# Altium PCB Industrial_IOT_Dev_Brd-v1.0.PcbDoc (part 1 of 8)
Units mil, origin at the board's own origin, x right, y up, seen from the top; angles counter-clockwise.
Board outline 6299.21 x 4724.41 mil, 4 copper layers (Top Layer, Layer 1, Layer 2, Bottom Layer), stack 62.047 mil thick; 376 components, 240 nets, 1129 pads, 635 vias.
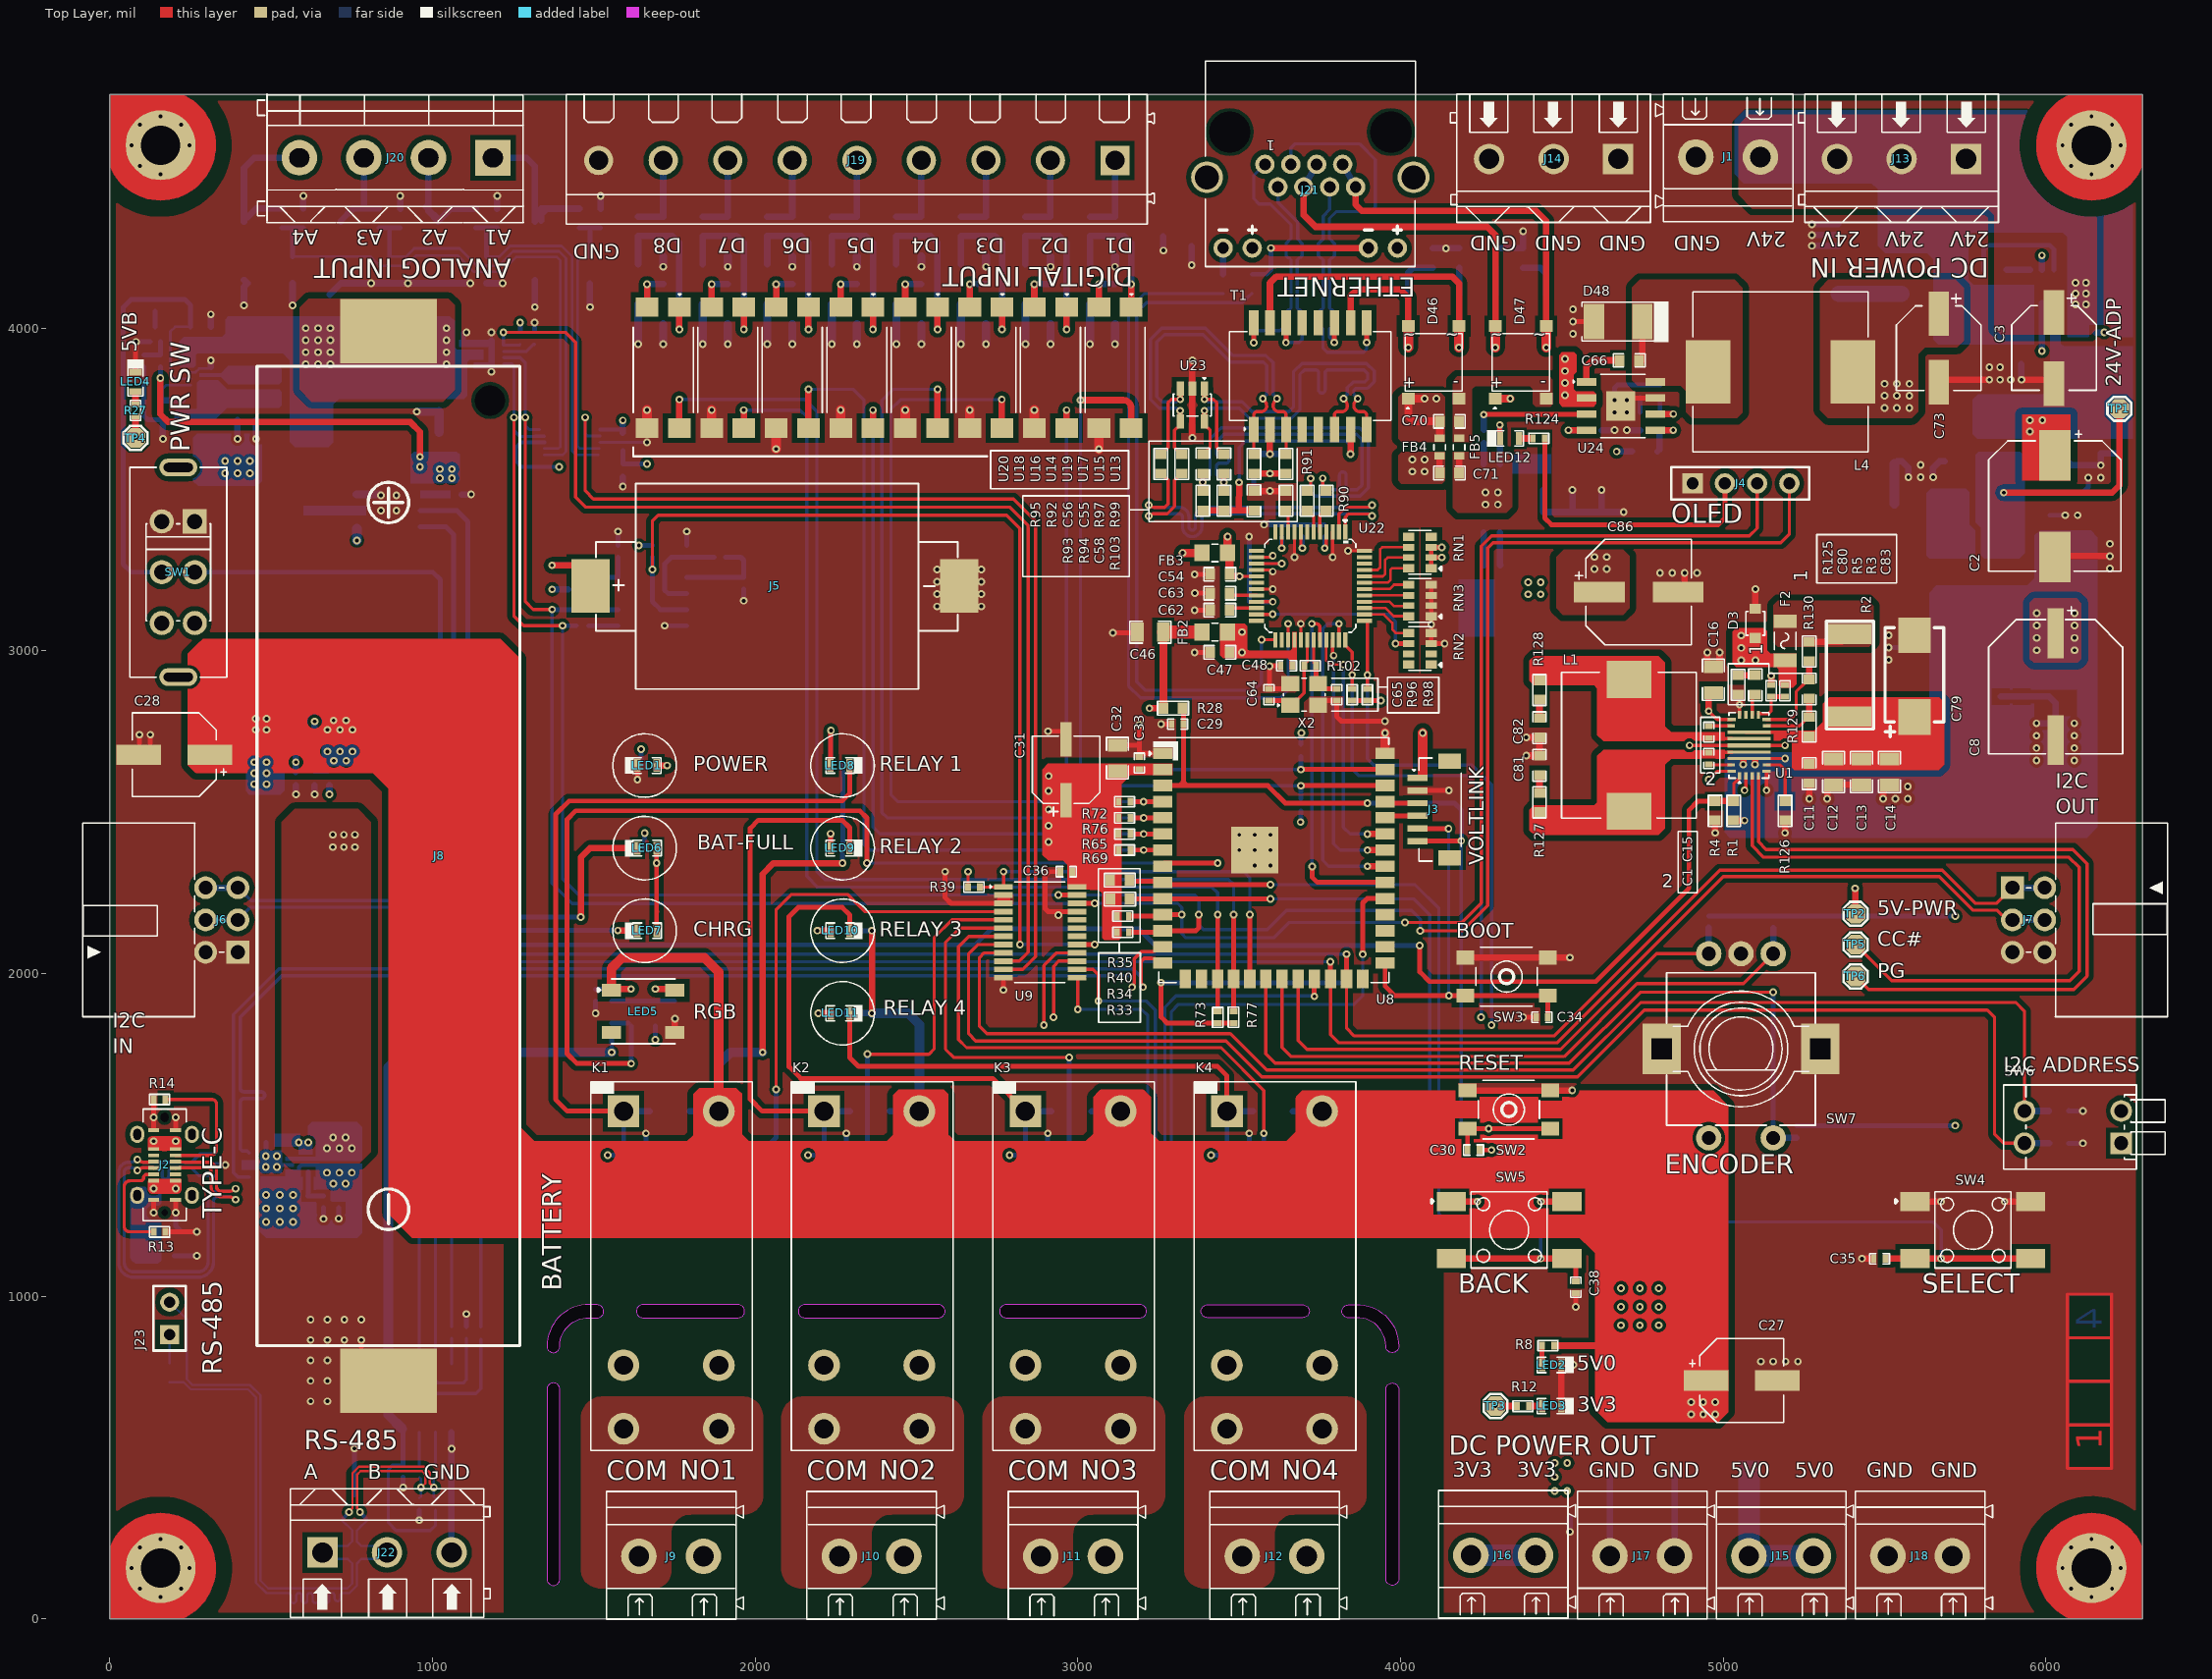
[diagram p0: Top Layer view]
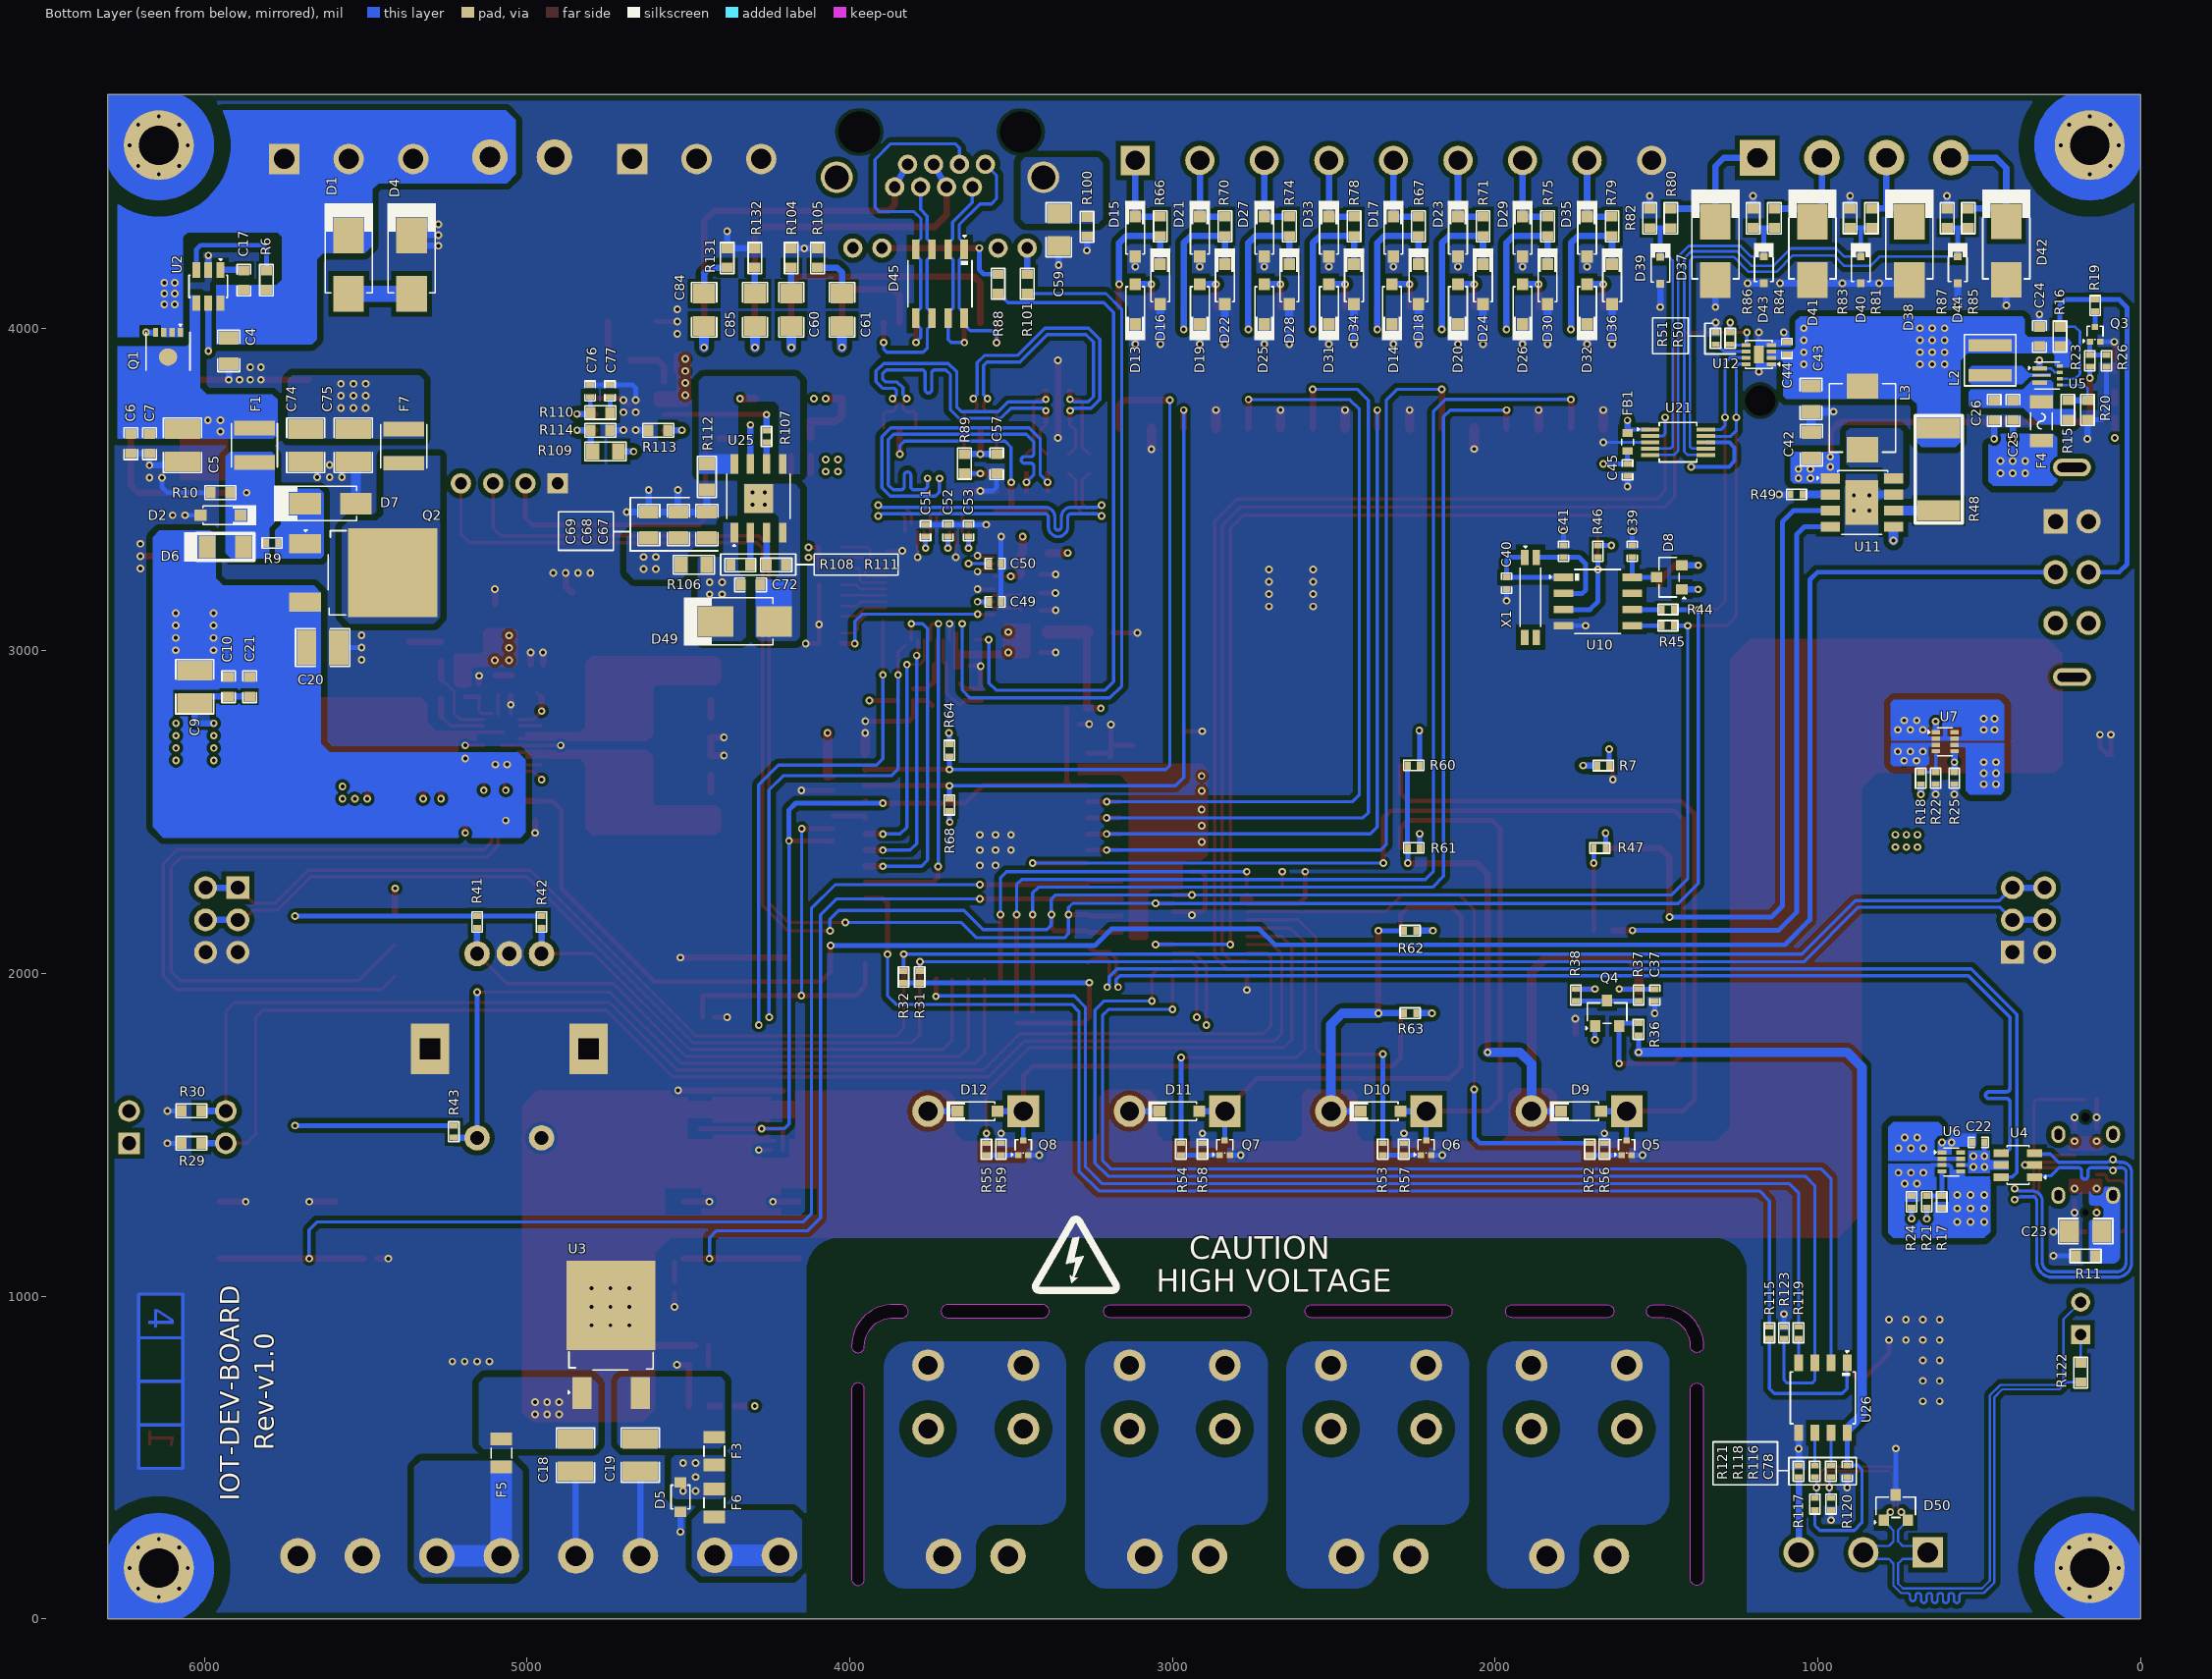
[diagram p1: Bottom Layer view, seen from below]
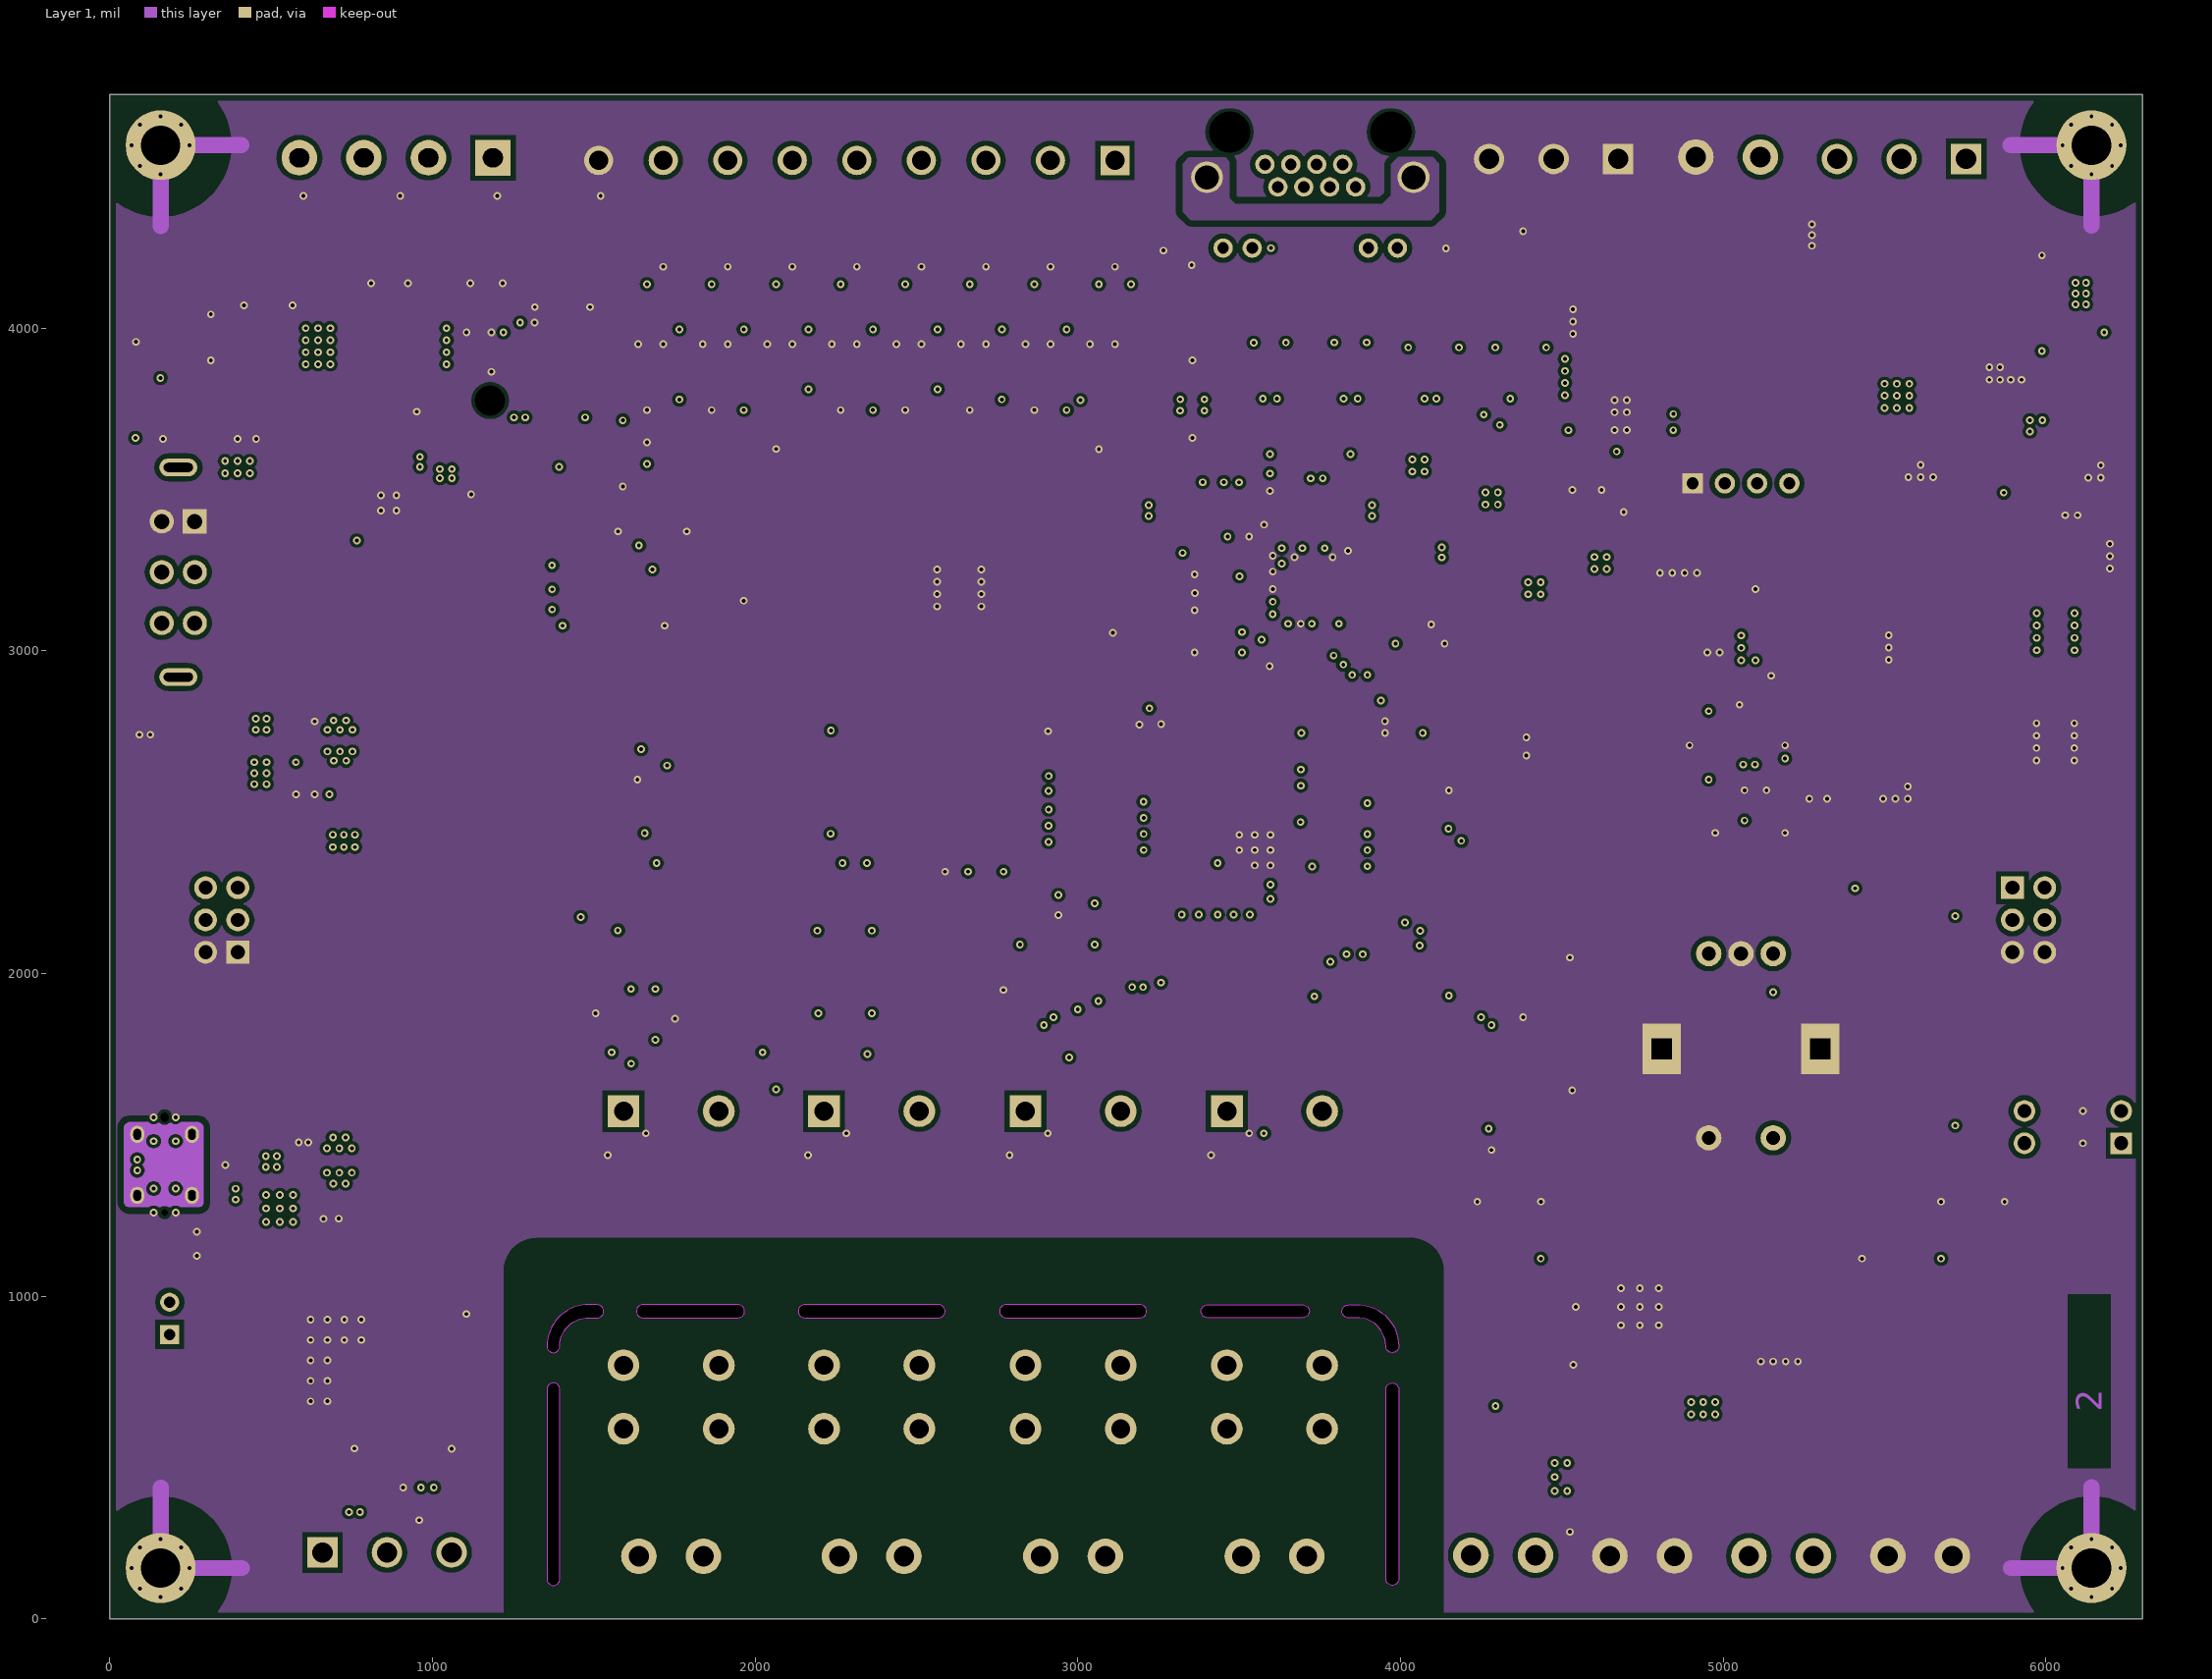
[diagram p2: Layer 1]
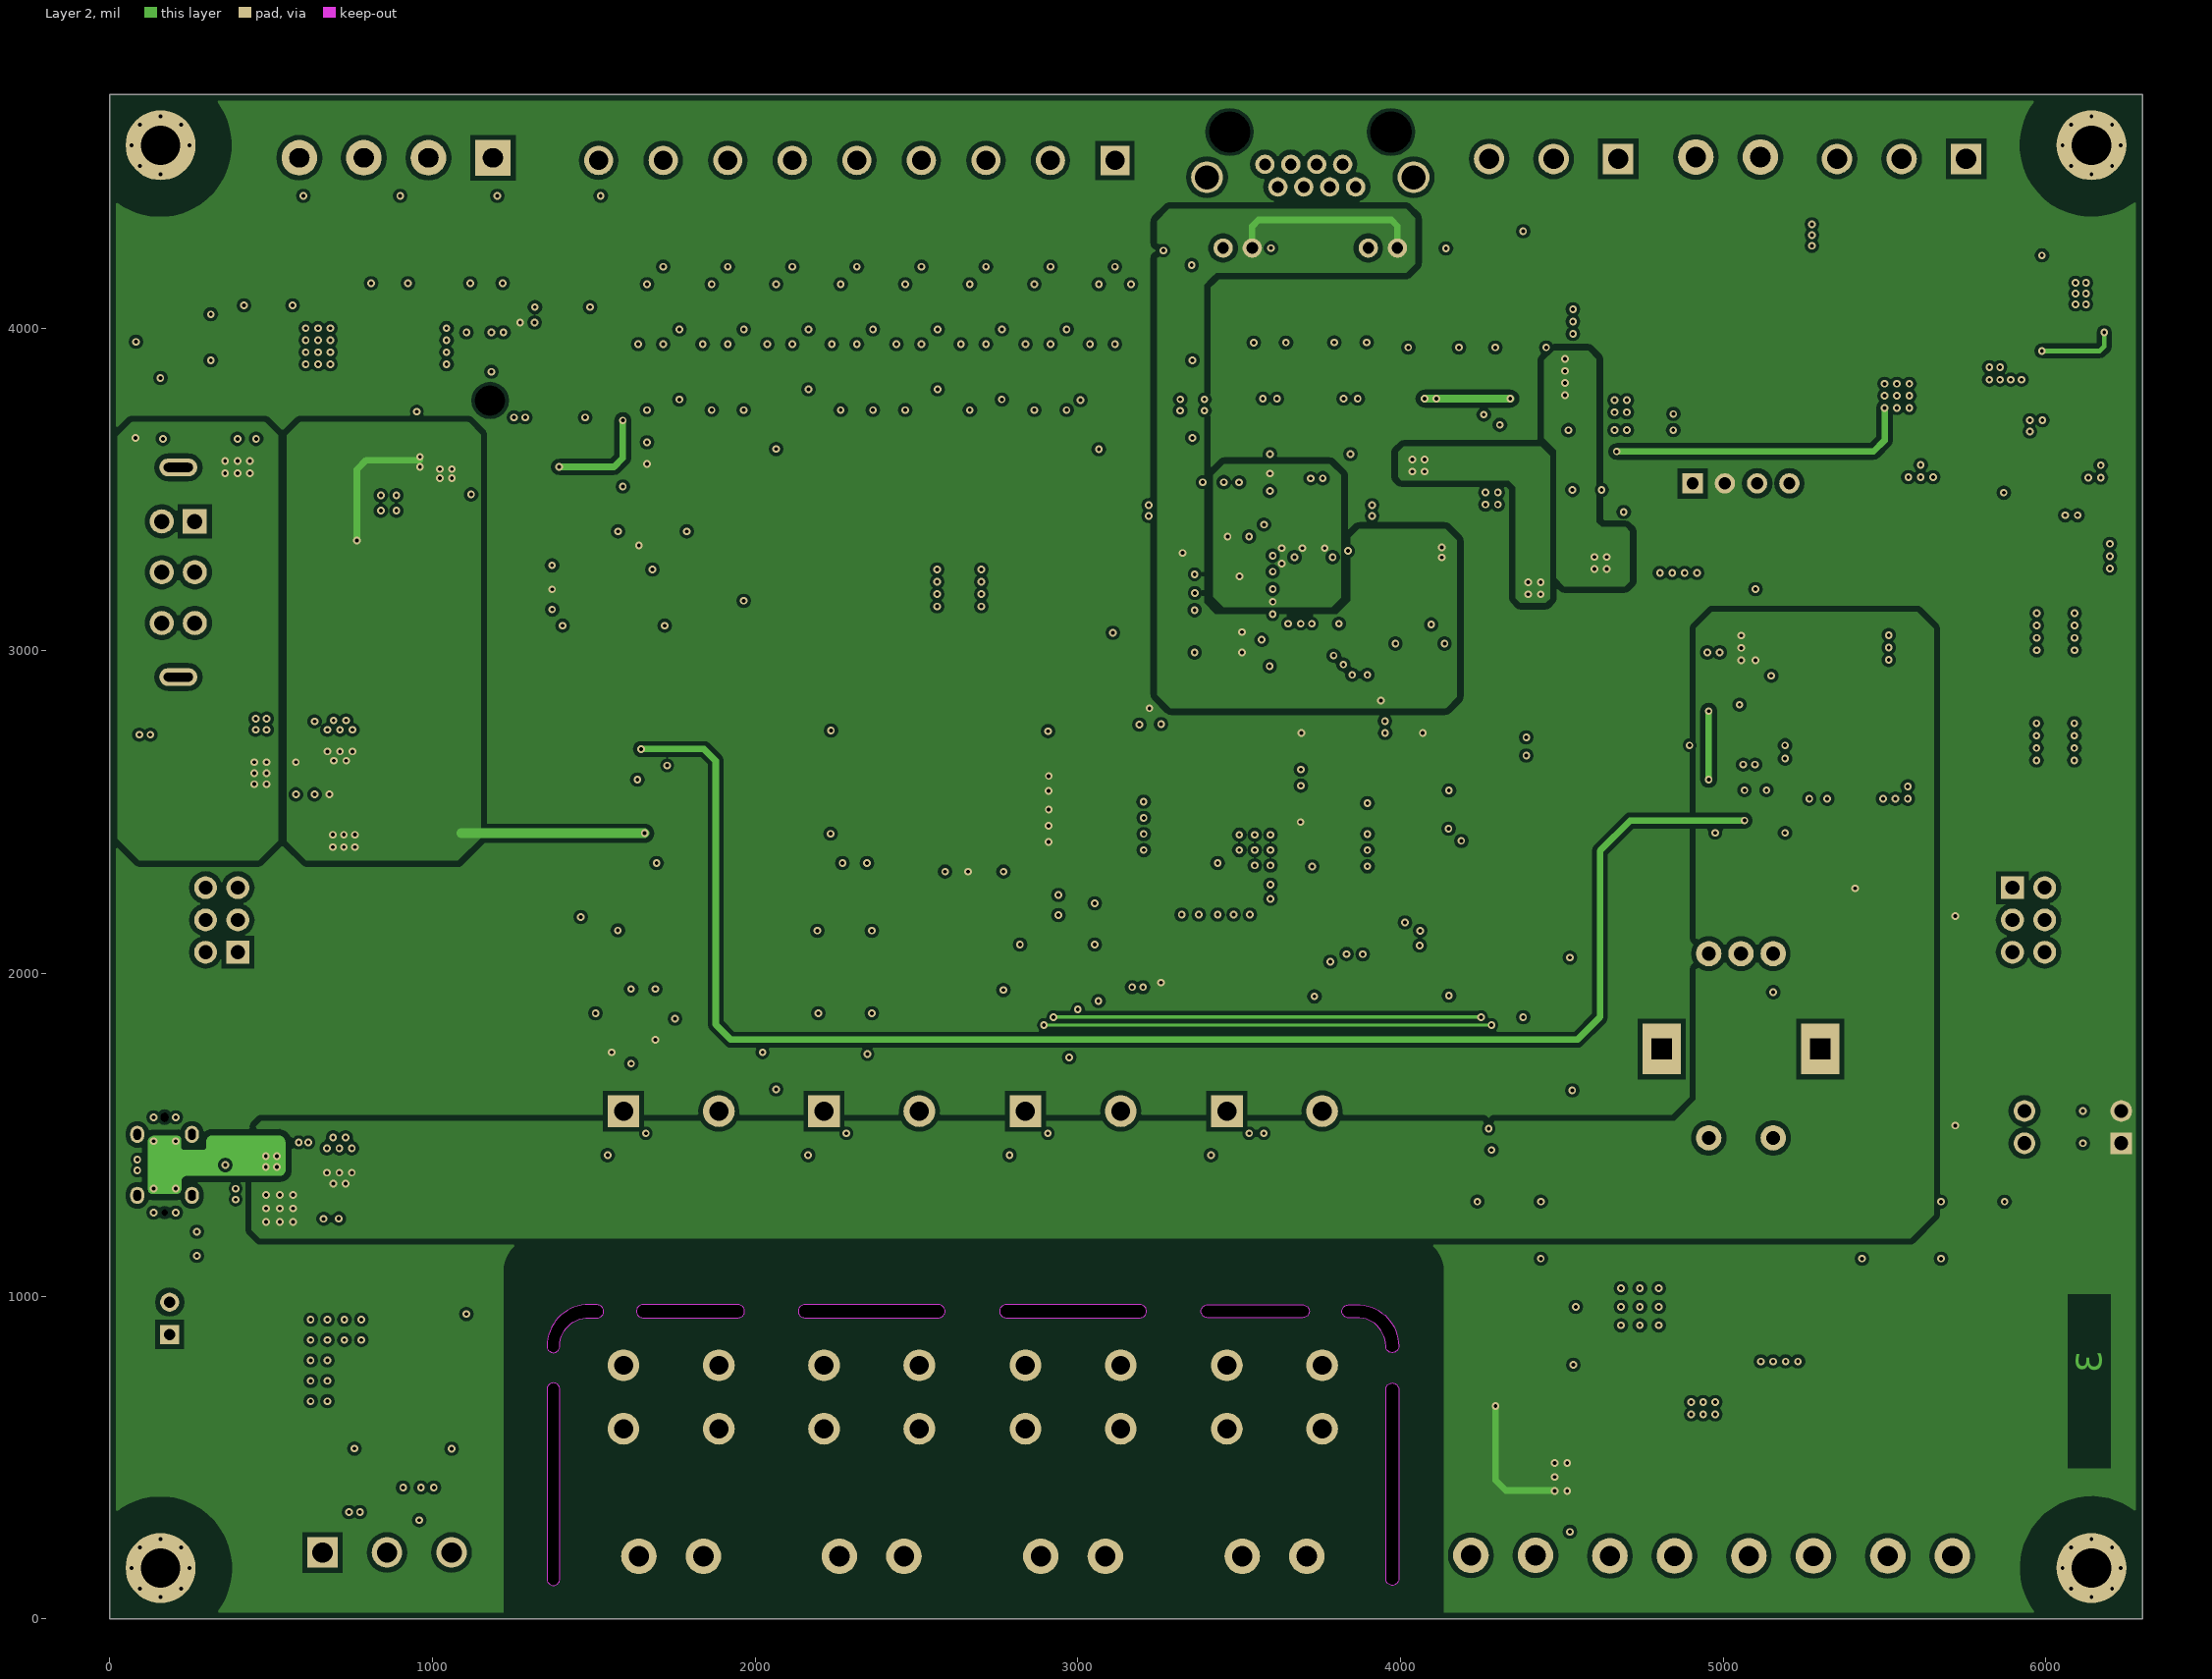
[diagram p3: Layer 2]
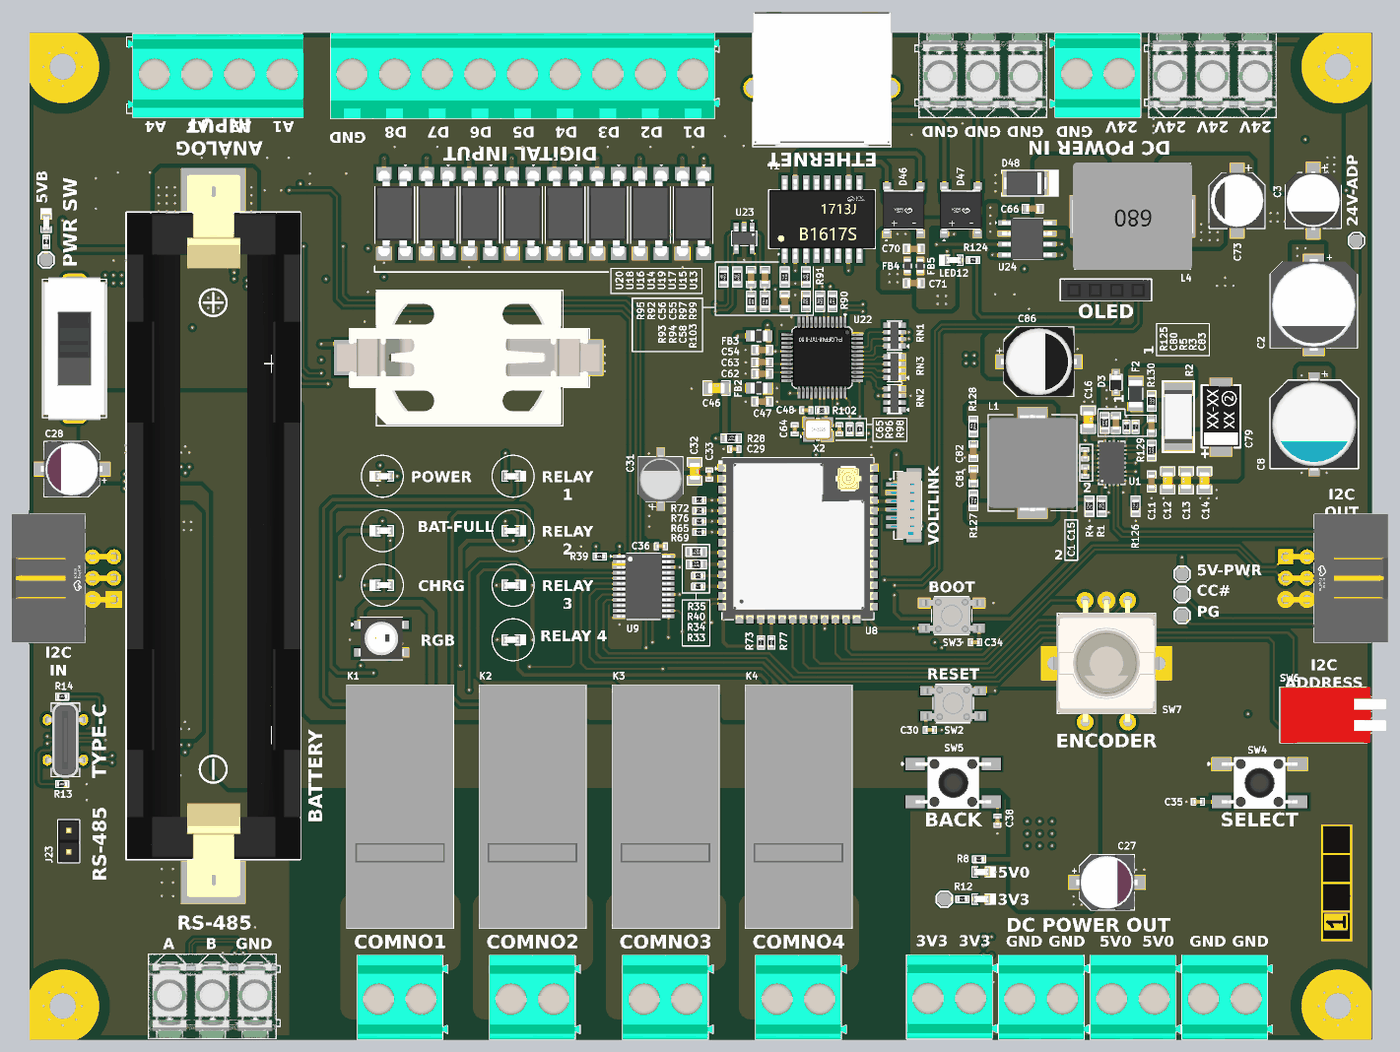
[diagram p8: 3D render of the assembled board from above, using the file's embedded part models]
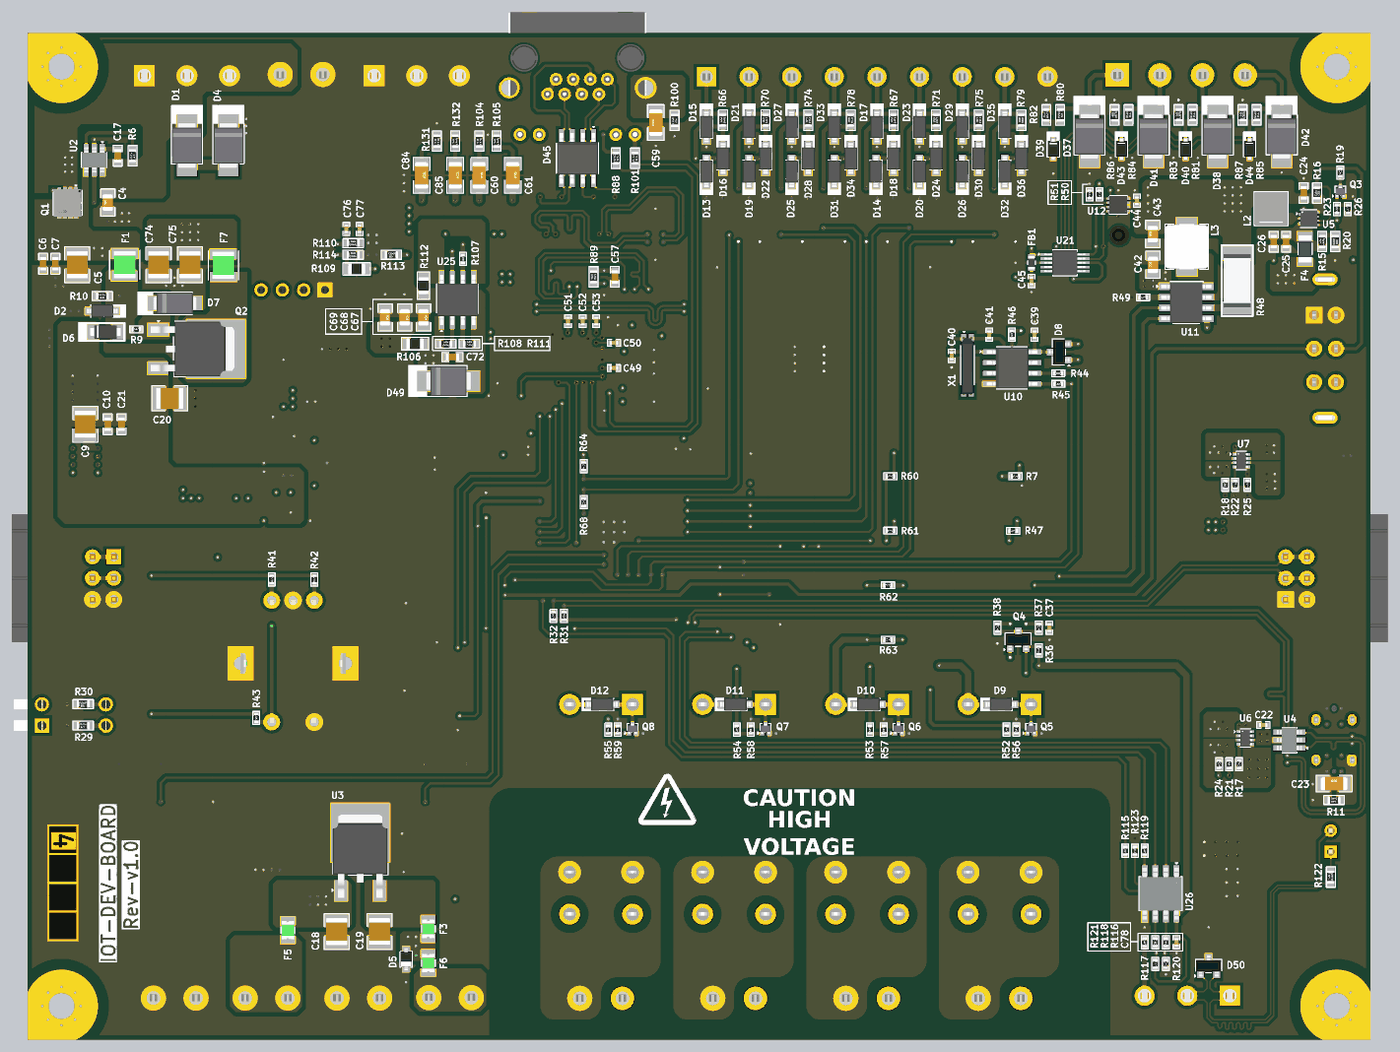
[diagram p9: 3D render of the assembled board from below, using the file's embedded part models]

## Layer stack, top to bottom
Top Solder: solder mask 1, SM-001, Dk 4
Top Layer: signal copper 1.378
Dielectric 2: prepreg 7.992, PP-006, Dk 4.4
Layer 1: signal copper 1.378
Dielectric 1: dielectric 40.551, FR-4, Dk 4.6
Layer 2: signal copper 1.378
Dielectric 3: prepreg 7.992, PP-006, Dk 4.4
Bottom Layer: signal copper 1.378
Bottom Solder: solder mask 1, SM-001, Dk 4

## Board outline
0,0 6299.21,0 6299.21,4724.41 0,4724.41
cut-out: 3994.53,124.01 cw(c3974.52,124.01) 3974.52,103.99 cw(c3974.52,124.01) 3954.5,124.01 3954.5,711.52 cw(c3974.52,711.52) 3974.52,731.53 cw(c3974.52,711.52) 3994.53,711.52
cut-out: 1354.99,124.01 ccw(c1375,124.01) 1375,103.99 ccw(c1375,124.01) 1395.01,124.01 1395.01,711.52 ccw(c1375,711.52) 1375,731.53 ccw(c1375,711.52) 1354.99,711.52
cut-out: 3697.23,933.5 3401.93,933.5 cw(c3401.93,953.51) 3381.92,953.51 cw(c3401.93,953.51) 3401.93,973.53 3697.23,973.53 cw(c3697.23,953.51) 3717.25,953.51 cw(c3697.23,953.51)
cut-out: 1652.28,933.5 1947.58,933.5 ccw(c1947.58,953.51) 1967.6,953.51 ccw(c1947.58,953.51) 1947.58,973.53 1652.28,973.53 ccw(c1652.28,953.51) 1632.27,953.51 ccw(c1652.28,953.51)
cut-out: 2133.62,953.51 ccw(c2153.64,953.51) 2153.64,933.5 2568.94,933.5 ccw(c2568.94,953.51) 2588.95,953.51 ccw(c2568.94,953.51) 2568.94,973.53 2153.64,973.53 ccw(c2153.64,953.51)
cut-out: 2757.77,953.51 ccw(c2777.79,953.51) 2777.79,933.5 3193.09,933.5 ccw(c3193.09,953.51) 3213.1,953.51 ccw(c3193.09,953.51) 3193.09,973.53 2777.79,973.53 ccw(c2777.79,953.51)
cut-out: 3994.53,845.5 cw(c3974.52,845.5) 3954.5,845.5 ccw(c3866.5,845.5) 3873.14,933.25 3838.63,933.25 cw(c3838.63,953.26) 3818.62,953.26 cw(c3838.63,953.26) 3838.63,973.28 3863.34,973.28 3866.5,973.53 cw(c3866.5,845.5) 3875.23,973.23 cw(c3866.5,845.5)
cut-out: 1354.99,845.5 ccw(c1375,845.5) 1395.01,845.5 cw(c1483.02,845.5) 1476.37,933.25 1510.88,933.25 ccw(c1510.88,953.26) 1530.9,953.26 ccw(c1510.88,953.26) 1510.88,973.28 1486.18,973.28 1483.02,973.53 ccw(c1483.02,845.5) 1474.29,973.23 ccw(c1483.02,845.5)

## Design rules (kind name [scope] priority, off if disabled: settings)
BoardOutlineClearance [All] p1: gap=0 ignorepadtopadclearanceinfootprint=FALSE except(20: SMDPad-OutlineEdge THPad-OutlineEdge Via-OutlineEdge Fill-OutlineEdge Poly-OutlineEdge)
Clearance [All] p1: gap=10 ignorepadtopadclearanceinfootprint=FALSE except(4: SMDPad-SMDPad; 7: Arc-Arc Arc-Track Arc-SMDPad Arc-Fill Track-Track Track-SMDPad Track-Via Track-Fill Track-Region Track-Text SMDPad-Fill SMDPad-Region THPad-THPad Fill-Fill; 15: Arc-Poly Track-Poly SMDPad-Poly THPad-Poly; 20: Fill-Poly Poly-Poly Poly-Region)
ComponentClearance [All] p1: gap=0 collisioncheckmode=3 verticalgap=0 showdistances=FALSE
DiffPairsRouting "DIFF_USB PRO" [InDifferentialPairClass('USB_PROGRAM_LINES')] p1: maxlimit=10 minlimit=10 mostfreqgap=10 toplayer_minwidth=11 toplayer_maxwidth=11 toplayer_prefwidth=11 midlayer1_minwidth=7.5 midlayer1_maxwidth=7.5 midlayer1_prefwidth=7.5 midlayer2_minwidth=7.5 midlayer2_maxwidth=7.5 midlayer2_prefwidth=7.5 bottomlayer_minwidth=11 bottomlayer_maxwidth=11 bottomlayer_prefwidth=11 impedanceprofiledriven=TRUE impedanceprofileid={FF5DAFE1-98B4-493E-B4A7-3D2591EC31F9} impedanceprofilevalue=90.000000 maxuncoupledlength=500
DiffPairsRouting DIFF_ETHERNET [InDifferentialPairClass('Ethernet_Lines')] p2: maxlimit=10 minlimit=5 mostfreqgap=10 toplayer_mingap=10 toplayer_minwidth=10 toplayer_maxwidth=10 toplayer_prefwidth=10 midlayer1_maxgap=5 midlayer1_prefgap=5 midlayer1_minwidth=2.68 midlayer1_maxwidth=2.68 midlayer1_prefwidth=2.68 midlayer2_maxgap=5 midlayer2_prefgap=5 midlayer2_minwidth=2.68 midlayer2_maxwidth=2.68 midlayer2_prefwidth=2.68 bottomlayer_mingap=10 bottomlayer_minwidth=10 bottomlayer_maxwidth=10 bottomlayer_prefwidth=10 impedanceprofiledriven=TRUE impedanceprofileid={8031B122-6700-4A9C-BC17-82BE1AD90A4A} impedanceprofilevalue=100.000000 maxuncoupledlength=500
DiffPairsRouting DIFF_USB [InDifferentialPairClass('USB')] p3: maxlimit=7 minlimit=5 mostfreqgap=7 toplayer_mingap=7 toplayer_minwidth=10 toplayer_maxwidth=10 toplayer_prefwidth=10 midlayer1_maxgap=5 midlayer1_prefgap=5 midlayer1_minwidth=4.16 midlayer1_maxwidth=4.16 midlayer1_prefwidth=4.16 midlayer2_maxgap=5 midlayer2_prefgap=5 midlayer2_minwidth=4.16 midlayer2_maxwidth=4.16 midlayer2_prefwidth=4.16 bottomlayer_mingap=7 bottomlayer_minwidth=10 bottomlayer_maxwidth=10 bottomlayer_prefwidth=10 impedanceprofiledriven=TRUE impedanceprofileid={6DBBDF28-FE65-4CCD-A315-FCB7FE8509EB} impedanceprofilevalue=90.000000 maxuncoupledlength=500
DiffPairsRouting DIFF_RS485 [InDifferentialPairClass('DIFF_RS485')] p4: maxlimit=15 minlimit=15 mostfreqgap=15 toplayer_minwidth=7 toplayer_maxwidth=7 toplayer_prefwidth=7 midlayer1_minwidth=4 midlayer1_maxwidth=4 midlayer1_prefwidth=4 midlayer2_minwidth=4 midlayer2_maxwidth=4 midlayer2_prefwidth=4 bottomlayer_minwidth=7 bottomlayer_maxwidth=7 bottomlayer_prefwidth=7 impedanceprofiledriven=TRUE impedanceprofileid={AF431588-A3C0-40A6-A26B-CB03469C8758} impedanceprofilevalue=120.000000 maxuncoupledlength=500
HoleSize [All] p1: absolutevalues=TRUE maxlimit=137.8 minlimit=1 maxpercent=80.000 minpercent=20.000
MatchedLengths "Schematic Matched Net Lengths_1" [InNetClass('USB_PROGRAM')] p1: tolerance=50 checknetsindiffpair=TRUE checkdiffpairvsdiffpair=FALSE checkxsignals=FALSE checkothers=FALSE
MatchedLengths "Schematic Matched Net Lengths" [InNetClass('Ethernet')] p2: tolerance=20 checknetsindiffpair=FALSE checkdiffpairvsdiffpair=TRUE checkxsignals=TRUE checkothers=TRUE
MaxMinImpedance "Schematic Impedance Constraint_1" [InNetClass('Ethernet')] p1: minimum=97.00 maximum=105.0
MaxMinImpedance "Schematic Impedance Constraint" [InNetClass('USB_PROGRAM')] p2: minimum=85.00 maximum=90.00
MinimumSolderMaskSliver [All] p1: minsoldermaskwidth=0
PolygonConnect [All] p1: connectstyle=Direct reliefconductorwidth=10 reliefentries=4 polygonreliefangle="90 Angle" airgapwidth=10
RoutingVias [All] p1: holewidth=11.81 width=23.62 viastyle="Through Hole" minholewidth=11.81 minwidth=23.62 maxholewidth=11.81 maxwidth=23.62
SilkToSilkClearance [All] p1: silktosilkclearance=0
SilkToSolderMaskClearance [IsPad] p1: minsilkscreentomaskgap=0 clearancetoexposedcopper=TRUE
SolderMaskExpansion [All] p1: expansion=4 istentingtop=FALSE
SupplyNets "Schematic Supply Nets_17" [InNet('GND')] p1: voltage=0.000
SupplyNets "Schematic Supply Nets_16" [InNet('24V')] p2: voltage=0.000
SupplyNets "Schematic Supply Nets_15" [InNet('VIN')] p3: voltage=0.000
SupplyNets "Schematic Supply Nets_14" [InNet('3V3')] p4: voltage=0.000
SupplyNets "Schematic Supply Nets_13" [InNet('5V-OR')] p5: voltage=0.000
SupplyNets "Schematic Supply Nets_12" [InNet('VDD_POE')] p6: voltage=0.000
SupplyNets "Schematic Supply Nets_11" [InNet('VBUS-TYPEC')] p7: voltage=0.000
SupplyNets "Schematic Supply Nets_10" [InNet('VDD')] p8: voltage=0.000
SupplyNets "Schematic Supply Nets_9" [InNet('VCC')] p9: voltage=0.000
SupplyNets "Schematic Supply Nets_8" [InNet('24V-ADAP')] p10: voltage=0.000
SupplyNets "Schematic Supply Nets_7" [InNet('VSS_POE')] p11: voltage=0.000
SupplyNets "Schematic Supply Nets_6" [InNet('5V-PWR')] p12: voltage=0.000
SupplyNets "Schematic Supply Nets_5" [InNet('5V')] p13: voltage=0.000
SupplyNets "Schematic Supply Nets_4" [InNet('3V3-FIL')] p14: voltage=0.000
SupplyNets "Schematic Supply Nets_3" [InNet('VBAT')] p15: voltage=0.000
SupplyNets "Schematic Supply Nets_2" [InNet('24V-POE')] p16: voltage=0.000
SupplyNets "Schematic Supply Nets_1" [InNet('VDDA')] p17: voltage=0.000
SupplyNets "Schematic Supply Nets" [InNet('5V-BOOST')] p18: voltage=0.000
Width [All] p1: maxlimit=50 minlimit=8 preferedwidth=8 minimp=50.000000 maximp=50.000000 favimp=50.000000
24 further rules are at their usual default settings.

## Classes and differential pairs
differential pair class USB: TYPEC_D
differential pair class USB_PROGRAM_LINES: TYPEC
differential pair class Ethernet_Lines: #RD #TD RD TD
net class USB_PROGRAM: TYPEC_N TYPEC_P
net class Ethernet: #RD_N #RD_P #TD_N #TD_P RD_N RD_P TD_N TD_P
component class Terminal-Sheet: F5 F6 J13 J14 J15 J16 J17 J18
component class RS485-Sheet: C78 D50 J22 J23 R115 R116 R117 R118 R119 R120 R121 R122 R123 U26
component class Power-Sheet: C1 C2 C3 C4 C5 C6 C7 C8 C9 C10 C11 C12 C13 C14 C15 C16 C17 C18 C19 C20 C21 C22 C23 C24 C25 C26 C27 C28 C79 C80 C81 C82 C83 D1 D2 D3 D4 D5 D6 D7 F1 F2 F3 F4 J1 J2 L1 L2 LED1 LED2 LED3 LED4 Q1 Q2 Q3 R1 R2 R3 R4 R5 R6 R7 R8 R9 R10 R11 R12 R13 R14 R15 R16 R17 R18 R19 R20 R21 R22 R23 R24 R25 R26 R27 R125 R126 R127 R128 R129 R130 SW1 TP1 TP2 TP3 TP4 TP5 TP6 U1 U2 U3 U4 U5 U6 U7
component class Power-Relay-Sheet: D9 D10 D11 D12 J9 J10 J11 J12 K1 K2 K3 K4 LED8 LED9 LED10 LED11 Q5 Q6 Q7 Q8 R52 R53 R54 R55 R56 R57 R58 R59 R60 R61 R62 R63
component class Ethernet-PoE-Sheet: C46 C47 C48 C49 C50 C51 C52 C53 C54 C55 C56 C57 C58 C59 C60 C61 C62 C63 C64 C65 C66 C67 C68 C69 C70 C71 C72 C73 C74 C75 C76 C77 C84 C85 C86 D45 D46 D47 D48 D49 F7 FB2 FB3 FB4 FB5 J21 L4 LED12 R88 R89 R90 R91 R92 R93 R94 R95 R96 R97 R98 R99 R100 R101 R102 R103 R104 R105 R106 R107 R108 R109 R110 R111 R112 R113 R114 R124 R131 R132 RN1 RN2 RN3 T1 U22 U23 U24 U25 X2
component class Digital-Input-Sheet: D13 D14 D15 D16 D17 D18 D19 D20 D21 D22 D23 D24 D25 D26 D27 D28 D29 D30 D31 D32 D33 D34 D35 D36 J19 R64 R65 R66 R67 R68 R69 R70 R71 R72 R73 R74 R75 R76 R77 R78 R79 U13 U14 U15 U16 U17 U18 U19 U20
component class Controller-Sheet: C29 C30 C31 C32 C33 C34 C35 C36 C37 C38 C39 C40 C41 D8 J3 J4 J5 J6 J7 LED5 Q4 R28 R29 R30 R31 R32 R33 R34 R35 R36 R37 R38 R39 R40 R41 R42 R43 R44 R45 R46 SW2 SW3 SW4 SW5 SW6 SW7 U8 U9 U10 X1
component class Battery-Charging-Sheet: C42 C43 C44 J8 L3 LED6 LED7 R47 R48 R49 R50 R51 U11 U12
component class Analog-Input-Sheet: C45 D37 D38 D39 D40 D41 D42 D43 D44 FB1 J20 R80 R81 R82 R83 R84 R85 R86 R87 U21
differential pair class RS485: RS485
differential pair #TD: +#TD_P -#TD_N
differential pair #RD: +#RD_P -#RD_N
differential pair TYPEC: +TYPEC_P -TYPEC_N
differential pair TYPEC_D: +TYPEC_D_P -TYPEC_D_N
differential pair TD: +TD_P -TD_N
differential pair RD: +RD_P -RD_N
differential pair RS485: +RS485_P -RS485_N

## Components (designator, comment, footprint, x,y, rotation, side; value= is the part's Value field where it differs from the comment)
C1 "0.1uF" Cap-0402 4955.04,2666.01 r90 top locked value=100nF
C2 "220uF" UCD-220uF-10mmDia 6027.73,3448.53 r270 top locked
C3 "47uF" RVT1H470M0607 6025.13,3938.13 r270 top locked
C4 "22nF" Cap-0805 5924.33,3929.13 r90 bottom
C5 "10uF" Cap-1210 6067.73,3636.91 r90 bottom
C6 "1uF" Cap-0603 6227.73,3641.92 r90 bottom
C7 "0.1uF" Cap-0603 6170.26,3641.92 r90 bottom value=100nF
C8 "120uF" OVZ121M1VTR-1013 6029.89,2888.53 r270 top locked
C9 "10uF" Cap-1210 6029.89,2888.53 r90 bottom
C10 "1uF" Cap-0603 5924.89,2888.53 r90 bottom
C11 "1uF" Cap-0603 5266.72,2619.58 r90 top locked
C12 "22uF" Cap-0805 5342.26,2624.58 r90 top locked
C13 "22uF" Cap-0805 5428.79,2624.58 r90 top locked
C14 "22uF" Cap-0805 5515.32,2624.59 r90 top locked
C15 "0.1uF" Cap-0402 4955.03,2747.9 r270 top locked value=100nF
C16 "4.7uF" Cap-0805 4969.65,2910.45 r270 top locked
C17 "1uF" Cap-0603 5877.73,4148.53 r270 bottom
C18 "10uF" Cap-1210 4850,507.47 r90 bottom
C19 "10uF" Cap-1210 4649.45,508.01 r90 bottom
C20 "10uF" Cap-1210 5633.66,3010.09 r0 bottom
C21 "0.1uF" Cap-0603 5860,2888.53 r90 bottom value=100nF
C22 "0.1uF" Cap-0402 503.09,1476.73 r0 bottom value=100nF
C23 "4.7nF" Cap-1206 170.28,1202.02 r180 bottom
C24 "10uF" Cap-0603 313.27,3973.84 r270 bottom
C25 "4.7uF" Cap-0603 395.71,3745 r90 bottom
C26 "4.7uF" Cap-0603 453.73,3745 r90 bottom
C27 "120uF" 20SVPF120M 5057.42,738.7 r0 top locked
C28 "120uF" 20SVPF120M 200,2678 r180 top locked
C29 "1uF" Cap-0402 3309,2772.58 r0 top locked
C30 "0.1uF" Cap-0402 4226.38,1453.21 r180 top locked value=100nF
C31 "47uF" RVT1E470M0505 2963.57,2631.32 r90 top locked
C32 "22uF" Cap-0805 3123.08,2667.53 r270 top locked
C33 "0.1uF" Cap-0402 3190.72,2651.9 r90 top locked value=100nF
C34 "0.1uF" Cap-0402 4438.24,1865 r0 top locked value=100nF
C35 "0.1uF" Cap-0402 5484.34,1116.68 r0 top locked value=100nF
C36 "0.1uF" Cap-0402 2964.5,2315.69 r180 top locked value=100nF
C37 "0.1uF" Cap-0402 1505.83,1933.3 r270 bottom value=100nF
C38 "0.1uF" Cap-0402 4543.59,1028.29 r90 top locked value=100nF
C39 "0.1uF" Cap-0402 1575.39,3308.36 r270 bottom value=100nF
C40 "10pF" Cap-0402 1964.69,3209.36 r90 bottom
C41 "DNP" Cap-0402 1787.99,3308.36 r270 bottom value=10pF
C42 "22uF" Cap-0805 1020,3637 r90 bottom
C43 "22uF" Cap-0805 1021,3781 r90 bottom
C44 "1uF" Cap-0402 1095.71,3937.16 r270 bottom
C45 "0.1uF" Cap-0402 1590,3560.5 r270 bottom value=100nF
C46 "22uF" Cap-0805 3225,3057.97 r0 top locked
C47 "10uF" Cap-0603 3440,2995 r0 top locked
C48 "0.1uF" Cap-0402 3646.79,2954.28 r180 top locked value=100nF
C49 "0.1uF" Cap-0402 3549.5,3152.06 r180 bottom value=100nF
C50 "0.1uF" Cap-0402 3549.5,3270.17 r180 bottom value=100nF
C51 "0.1uF" Cap-0402 3765.02,3372.47 r90 bottom value=100nF
C52 "0.1uF" Cap-0402 3696.28,3372.47 r90 bottom value=100nF
C53 "0.1uF" Cap-0402 3632.22,3372.47 r90 bottom value=100nF
C54 "10uF" Cap-0603 3439.81,3237.1 r0 top locked
C55 "6.8nF" Cap-0603 3452.71,3579.46 r270 top
C56 "6.8nF" Cap-0603 3387.39,3579.47 r270 top
C57 "22nF" Cap-0603 3545,3580 r90 bottom
C58 "10nF" Cap-0603 3545.4,3465 r270 top locked
C59 "4.7nF" Cap-1206 3352.73,4304.14 r90 bottom
C60 "1000pF" Cap-1206 4181.47,4056.64 r270 bottom
C61 "1000pF" Cap-1206 4023.99,4056.64 r270 bottom
C62 "10nF" Cap-0603 3439.81,3126.08 r0 top locked
C63 "4.7uF" Cap-0603 3439.81,3178.84 r0 top locked
C64 "22PF" Cap-0402 3592.66,2864.29 r270 top locked value=22pF
C65 "22PF" Cap-0402 3802.15,2864.28 r90 top locked value=22pF
C66 "0.1uF" Cap-0603 4709.02,3900 r180 top locked
C67 "2.2uF" Cap-0805 4442.73,3390 r270 bottom
C68 "2.2uF" Cap-0805 4531,3390 r270 bottom
C69 "2.2uF" Cap-0805 4623,3390 r270 bottom
C70 "1nF" Cap-0603 4151.47,3711 r180 top locked
C71 "1nF" Cap-0603 4151.47,3551 r180 top locked
C72 "0.1uF" Cap-0603 4307,3204 r0 bottom
C73 "68uF" RVT1H680M0607 5667.73,3938.53 r270 top locked
C74 "10uF" Cap-1210 5686,3636.92 r90 bottom
C75 "10uF" Cap-1210 5538.73,3636.92 r90 bottom
C76 "6.8pF" Cap-0402 4805.03,3805.09 r270 bottom
C77 "4.7nF" Cap-0402 4743.1,3805.1 r270 bottom
C78 "0.1uF" Cap-0402 909.46,457.59 r270 bottom value=100nF
C79 "220uF" Case-E 5592.66,2794.83 r90 top locked
C80 "10nF" Cap-0603 5099.73,2894.45 r270 top locked
C81 "DNP" Cap-0603 4430.67,2645.34 r270 top locked
C82 "DNP" Cap-0603 4430.66,2761.82 r270 top locked
C83 "0.1uF" Cap-0603 5266.72,2881.41 r270 top locked value=100nF
C84 "1000pF" Cap-1206 4451.47,4056.64 r270 bottom
C85 "1000pF" Cap-1206 4293.99,4056.64 r270 bottom
C86 "22uF" EEEFK1J220P 4738,3182 r0 top locked
D1 "SMBJ58A-13-F" SMB_ 5552.84,4196.72 r90 bottom
D2 "AZ4024-01G" SOD-123 5950,3420 r180 bottom
D3 "PESD5V0S1BA,115-ES" "SOD-323 (Bi-directional)" 5099.73,3085 r270 top locked
D4 "SMBJ26A-13-F" SMB_ 5357.73,4196.72 r90 bottom
D5 "PESD3V3L1BA-N-ES" "SOD-323 (Bi-directional)" 4524.82,377.71 r90 bottom
D6 "PMEG4030ER" SOD-123FL 5935.27,3321.72 r180 bottom
D7 "1SMA5930BT3G" SMA 5609.28,3456.3 r180 bottom
D8 "BAT54C" SOT-23 1460.63,3227.86 r90 bottom
D9 "1N4148W-7-F" SOD-123 1733.73,1573.62 r0 bottom value=2pF
D10 "1N4148W-7-F" SOD-123 2355.09,1573.62 r0 bottom value=2pF
D11 "1N4148W-7-F" SOD-123 2979.24,1573.62 r0 bottom value=2pF
D12 "1N4148W-7-F" SOD-123 3604.39,1573.62 r0 bottom value=2pF
D13 "1N4148W-7-F" SOD-123 3115.31,4074.08 r270 bottom value=2pF
D14 "1N4148W-7-F" SOD-123 2319.9,4074.08 r270 bottom value=2pF
D15 "AZ4024-01G" SOD-123 3115.31,4283.53 r90 bottom
D16 "BZT52C24" SOD-123 3037.73,4136.09 r90 bottom
D17 "AZ4024-01G" SOD-123 2315.31,4283.53 r90 bottom
D18 "BZT52C24" SOD-123 2237.73,4136.09 r90 bottom
D19 "1N4148W-7-F" SOD-123 2915.31,4074.08 r270 bottom value=2pF
D20 "1N4148W-7-F" SOD-123 2115.31,4074.08 r270 bottom value=2pF
D21 "AZ4024-01G" SOD-123 2915.31,4283.53 r90 bottom
D22 "BZT52C24" SOD-123 2837.73,4136.09 r90 bottom
D23 "AZ4024-01G" SOD-123 2115.31,4283.53 r90 bottom
D24 "BZT52C24" SOD-123 2037.73,4136.09 r90 bottom
D25 "1N4148W-7-F" SOD-123 2715.31,4074.08 r270 bottom value=2pF
D26 "1N4148W-7-F" SOD-123 1915.31,4074.08 r270 bottom value=2pF
D27 "AZ4024-01G" SOD-123 2715.31,4283.53 r90 bottom
D28 "BZT52C24" SOD-123 2637.73,4136.09 r90 bottom
D29 "AZ4024-01G" SOD-123 1915.31,4283.53 r90 bottom
D30 "BZT52C24" SOD-123 1837.73,4136.09 r90 bottom
D31 "1N4148W-7-F" SOD-123 2515.31,4074.08 r270 bottom value=2pF
D32 "1N4148W-7-F" SOD-123 1715.31,4074.08 r270 bottom value=2pF
D33 "AZ4024-01G" SOD-123 2515.31,4283.53 r90 bottom
D34 "BZT52C24" SOD-123 2437.73,4136.09 r90 bottom
D35 "AZ4024-01G" SOD-123 1715.31,4283.53 r90 bottom
D36 "BZT52C24" SOD-123 1637.73,4136.09 r90 bottom
D37 "SMBJ12A" SMB_ 1317.67,4239.47 r90 bottom
D38 "SMBJ12A" SMB_ 716.68,4239.47 r90 bottom
D39 "MM3Z3V3B" SOD323F 1488.24,4178.92 r90 bottom
D40 "MM3Z3V3B" SOD323F 867.26,4180.26 r90 bottom
D41 "SMBJ12A" SMB_ 1017.18,4239.47 r90 bottom
D42 "SMBJ12A" SMB_ 416.19,4239.66 r90 bottom
D43 "MM3Z3V3B" SOD323F 1167.75,4180.26 r90 bottom
D44 "MM3Z3V3B" SOD323F 566.76,4180.26 r90 bottom
D45 "SLVU2.8-4BTG" "SOIC-8(0.154\", 3.90mm Width)" 3720.4,4136.89 r270 bottom
D46 "ABS210" ABS 4102.73,3894.04 r90 top locked
D47 "ABS210" ABS 4372.73,3894.04 r90 top locked
D48 "SK310A-LTP" SMA(DO-214AC) 4674.22,4020 r180 top locked
D49 "SMBJ58A" SMB_ 4325,3091 r0 bottom
D50 "SM712" SOT-23 758.81,345.57 r180 bottom
F1 "1210L075/24PR" FUSE-1210 5844.86,3636.92 r270 bottom
F2 "BSMD1206-300-6V" "Fuse 1206 (3216 Metric)" 5191.66,3031 r270 top locked
F3 "SMD0805B110TF" Fuse-0805 4420,520 r270 bottom
F4 "BSMD1206-300-6V" "Fuse 1206 (3216 Metric)" 306.94,3711.48 r270 bottom
F5 "SMD0805B110TF" Fuse-0805 5079.54,514.17 r270 bottom
F6 "0805L050WR" Fuse-0805 4420,360 r270 bottom
F7 "1210L075/24PR" FUSE-1210 5382.14,3634.16 r270 bottom
FB1 "120R" "IND-0603 (1608 Metric)" 1590,3647.09 r270 bottom
FB2 "CBM201209U601T" Ind-0805 3424.81,3057.97 r0 top locked
FB3 "CBM201209U601T" Ind-0805 3424.81,3303.24 r0 top locked
FB4 "MPZ1608S221ATD25" "IND-0603 (1608 Metric)" 4121.47,3631.56 r270 top locked
FB5 "MPZ1608S221ATD25" "IND-0603 (1608 Metric)" 4181.47,3631.56 r270 top locked
J1 "DB128L-5.08-2P-GN-S" DB128L-5.08-2P-GN-S 5015.21,4530.07 r0 top
J2 "U263-163N-4BQC65" U263-163N-4BQC65 170.28,1407.02 r90 top locked
J3 "Voltlink Target" "Voltlink Target" 4102.73,2508.17 r270 top locked
J4 "PM2.54-1*4" "HDR1X4 Female" 5055.1,3518.73 r0 top locked
J5 "CR2032-BS-6-1" CR2032-BS-6-1 2061.31,3201.34 r180 top locked
J6 "XDFH-0259-2*3P" XDFH-0259-2*3P 347.3,2165.99 r90 top locked
J7 "XDFH-0259-2*3P" XDFH-0259-2*3P 5946.19,2166 r270 top locked
J8 "BH-18650-B1BA002" BH-18650-B1BA002 1021.38,2364.41 r0 top locked
J9 "DB128L-5.08-2P-GN-S" DB128L-5.08-2P-GN-S 1739.93,194.29 r180 top locked
J10 "DB128L-5.08-2P-GN-S" DB128L-5.08-2P-GN-S 2361.29,194.29 r180 top locked
J11 "DB128L-5.08-2P-GN-S" DB128L-5.08-2P-GN-S 2985.44,194.29 r180 top locked
J12 "DB128L-5.08-2P-GN-S" DB128L-5.08-2P-GN-S 3609.59,194.29 r180 top locked
J13 "DB128L-5.08-3P-GN-S" DB128L-5.08-3P-GN-S 5752.84,4524.12 r180 top locked
J14 "DB128L-5.08-3P-GN-S" DB128L-5.08-3P-GN-S 4674.58,4524.12 r180 top
J15 "DB128L-5.08-2P-GN-S" DB128L-5.08-2P-GN-S 5179.54,195.38 r180 top locked
J16 "DB128L-5.08-2P-GN-S" DB128L-5.08-2P-GN-S 4318.28,197.38 r180 top locked
J17 "DB128L-5.08-2P-GN-S" DB128L-5.08-2P-GN-S 4748.91,195.38 r180 top locked
J18 "DB128L-5.08-2P-GN-S" DB128L-5.08-2P-GN-S 5610.17,195.38 r180 top locked
J19 "DB128V-5.08-9P-GN-S" DB128V-5.08-9P-GN-S 2315.31,4519.47 r180 top locked
J20 "DB128L-5.08-4P-GN-S" DB128L-5.08-4P-GN-S 887.67,4527.64 r180 top locked
J21 "R-RJ45R08P-C000" R-RJ45R08P-C000 3720.4,4427.66 r180 top locked
J22 "DB128L-5.08-3P-GN-S" DB128L-5.08-3P-GN-S 659.46,206.2 r0 top locked
J23 "X6511WV-02H-C60D30" HDR1X2_ 185.76,881.62 r90 top
K1 "G5RL-1A-E-HR-DC5" G5RL-1A-E-HR-DC5 1739.93,1081.48 r270 top locked
K2 "G5RL-1A-E-HR-DC5" G5RL-1A-E-HR-DC5 2361.29,1081.48 r270 top locked
K3 "G5RL-1A-E-HR-DC5" G5RL-1A-E-HR-DC5 2985.44,1081.48 r270 top locked
K4 "G5RL-1A-E-HR-DC5" G5RL-1A-E-HR-DC5 3609.58,1081.48 r270 top locked
L1 "4.7uH" YSPI1050-4R7M 4708.01,2706.96 r90 top locked
L2 "1uH" XFL4020-102MEC 466,3900 r270 bottom
L3 "2.2uH" YSPI0520-2R2M_ 861.9,3721.81 r90 bottom
L4 "68uH" FCH1365-680M 5177.73,3864.44 r0 top locked
LED1 "RED" LED-0603 1664.95,2644.45 r180 top locked
LED2 "RED" LED-0603 4468.19,787.4 r0 top locked
LED3 "RED" LED-0603 4468.19,659.96 r0 top locked
LED4 "RED" LED-0603 80,3833.35 r90 top locked
LED5 "WS2812B-XF02/W" WS2812B-XF02/W 1653.16,1882.77 r0 top locked
LED6 "Emerald" LED-0603 1665.18,2388.55 r180 top locked
LED7 "RED" LED-0603 1665.16,2132.66 r180 top locked
LED8 "Emerald" LED-0603 2263.5,2644.57 r0 top locked
LED9 "Emerald" LED-0603 2263.71,2388.68 r0 top locked
LED10 "Emerald" LED-0603 2263.71,2132.79 r0 top locked
LED11 "Emerald" LED-0603 2263.71,1876.89 r0 top locked
LED12 "Emerald" LED-0603 4337.53,3658.19 r180 top locked
Q1 "DMT6007LFG-7" PowerDI-3333-8 6112.73,3948.53 r270 bottom
Q2 "AOD4185-JSM" TO-252-2L 5552.19,3241.9 r270 bottom
Q3 "MMBT3904M" SOT-723 141.31,3980.84 r180 bottom
Q4 "Si2302CDS" Sot-23 1653.16,1876.77 r180 bottom
Q5 "MMBT3904M" SOT-723 1592.73,1459.89 r180 bottom
Q6 "MMBT3904M" SOT-723 2214.08,1459.89 r180 bottom
Q7 "MMBT3904M" SOT-723 2838.23,1459.89 r180 bottom
Q8 "MMBT3904M" SOT-723 3462.38,1459.89 r180 bottom
R1 "301K" res-0603 5032.84,2504.1 r270 top locked
R2 "12mR" RES-2512 5392.57,2924.36 r90 top locked
R3 "100K" Res-0402 5191.66,2876.45 r90 top locked
R4 "100K" Res-0603 4975.04,2504.11 r90 top locked
R5 "31.6K" Res-0402 5148.95,2876.45 r270 top locked value=31.6kR
R6 "100K" Res-0603 5807.73,4148.53 r90 bottom
R7 "3.9K" Res-0402 1664.95,2644.45 r0 bottom value=3.9kR
R8 "499R" Res-0402 4457.16,847 r180 top locked
R9 "4.7K" Res-0402 5790,3333.7 r0 bottom
R10 "100K" Res-0603 5950,3490 r180 bottom
R11 "1M" Res-0603 170.55,1125 r180 bottom
R12 "240R" Res-0402 4379.54,659.96 r0 top locked
R13 "5.1K" Res-0402 154.73,1200 r0 top locked
R14 "5.1K" Res-0402 154.73,1610 r180 top locked
R15 "732K" Res-0603 225.9,3746 r270 bottom
R16 "499K" Res-0603 250.28,3973.84 r90 bottom
R17 "3.3K" Res-0402 616.19,1292.49 r270 bottom
R18 "3.3K" Res-0402 680.94,2604.94 r270 bottom
R19 "0R" Res-0402 141.31,4070 r90 bottom
R20 "100K" Res-0603 164.9,3746 r90 bottom
R21 "1K" Res-0402 662.91,1292.49 r90 bottom
R22 "1K" Res-0402 634.87,2604.94 r90 bottom
R23 "4.7K" Res-0402 157.06,3898.75 r90 bottom
R24 "DNP" Res-0402 710,1293 r90 bottom
R25 "DNP" Res-0402 577,2604.94 r90 bottom
R26 "47K" Res-0402 105.6,3898.75 r90 bottom
R27 "499R" Res-0402 80,3744.7 r90 top locked
R28 "10K" Res-0603 3295,2822 r180 top locked
R29 "10K" Res-0603 6040,1474.1 r180 bottom
R30 "10K" Res-0603 6040,1575 r180 bottom
R31 "4.7K" Res-0402 3783.55,1989.17 r270 bottom
R32 "4.7K" Res-0402 3833.55,1989.17 r270 bottom
R33 "4.7K" Res-0402 3139.58,2127.53 r180 top locked
R34 "4.7K" Res-0402 3139.58,2177.53 r180 top locked
R35 "10K" Res-0603 3130.06,2289.53 r180 top locked
R36 "10K" Res-0402 1555.74,1827.27 r270 bottom
R37 "10K" Res-0402 1555.74,1933.5 r90 bottom
R38 "75R" Res-0402 1750,1933.5 r90 bottom
R39 "4.7K" Res-0402 2678.22,2268.08 r180 top locked
R40 "10K" Res-0603 3130.58,2230.53 r180 top locked
R41 "4.7K" Res-0402 5155.1,2160 r90 bottom
R42 "4.7K" Res-0402 4955.1,2160 r90 bottom
R43 "4.7K" Res-0402 5227.5,1509.83 r90 bottom
R44 "0R" Res-0402 1464.95,3127.86 r180 bottom
R45 "0R" Res-0402 1464.95,3077.86 r180 bottom
R46 "4.7K" Res-0402 1681.69,3308.36 r90 bottom
R47 "1K" Res-0402 1676.2,2388.54 r0 bottom
R48 "1K" RES-2512 625.57,3562.37 r90 bottom value=1kR
R49 "680R" Res-0402 1066.29,3484.41 r180 bottom
R50 "10K" Res-0402 1272,3968 r270 bottom
R51 "10K" Res-0402 1317,3968 r270 bottom
R52 "4.7K" Res-0402 1706.85,1455.89 r270 bottom
R53 "4.7K" Res-0402 2348.2,1455.89 r270 bottom
R54 "4.7K" Res-0402 2973.35,1455.9 r270 bottom
R55 "4.7K" Res-0402 3576.5,1455.89 r270 bottom
R56 "47K" Res-0402 1661.53,1455.89 r270 bottom
R57 "47K" Res-0402 2282.88,1455.89 r270 bottom
R58 "47K" Res-0402 2907.03,1455.89 r270 bottom
R59 "47K" Res-0402 3531.18,1455.89 r270 bottom
R60 "680R" Res-0402 2252.48,2644.58 r0 bottom
R61 "680R" Res-0402 2252.5,2389 r0 bottom
R62 "680R" Res-0402 2263.71,2132.79 r0 bottom
R63 "680R" Res-0402 2263.71,1876.89 r0 bottom
R64 "4.7K" Res-0402 3691,2691.5 r90 bottom
R65 "4.7K" Res-0402 3144.57,2432.53 r180 top locked
R66 "1.5K" Res-0603 3037.73,4315.54 r270 bottom
R67 "1.5K" Res-0603 2237.73,4315.54 r270 bottom
R68 "4.7K" Res-0402 3691,2522.5 r270 bottom
R69 "4.7K" Res-0402 3144.58,2382.53 r180 top locked
R70 "1.5K" Res-0603 2837.73,4315.54 r270 bottom
R71 "1.5K" Res-0603 2037.73,4315.54 r270 bottom
R72 "4.7K" Res-0402 3144.58,2532.03 r180 top locked
R73 "4.7K" Res-0402 3433.81,1864.27 r270 top locked
R74 "1.5K" Res-0603 2637.73,4315.54 r270 bottom
R75 "1.5K" Res-0603 1837.73,4315.54 r270 bottom
R76 "4.7K" Res-0402 3144.58,2482.53 r180 top locked
R77 "4.7K" Res-0402 3483.1,1864.98 r270 top locked
R78 "1.5K" Res-0603 2437.73,4315.54 r270 bottom
R79 "1.5K" Res-0603 1637.73,4315.54 r270 bottom
R80 "3.74K" Res-0603 1455.29,4340.14 r90 bottom
R81 "3.74K" Res-0603 834.3,4340.27 r90 bottom
R82 "1.8k" Res-0603 1521.2,4340.14 r270 bottom
R83 "1.8k" Res-0603 900.21,4340.27 r270 bottom
R84 "3.74K" Res-0603 1134.79,4340.21 r90 bottom
R85 "3.74K" Res-0603 533.81,4340.33 r90 bottom
R86 "1.8k" Res-0603 1200.71,4340.21 r270 bottom
R87 "1.8k" Res-0603 599.72,4340.33 r270 bottom
R88 "330R" Res-0603 3540.49,4136.89 r90 bottom
R89 "10R" Res-0603 3645,3580 r270 bottom
R90 "33R" Res-0603 3769.61,3465.01 r270 top locked
R91 "33R" Res-0603 3710.96,3465 r270 top locked
R92 "33R" Res-0603 3322.59,3579.48 r270 top
R93 "75R" Res-0603 3387.4,3465 r90 top locked
R94 "75R" Res-0603 3452.71,3465 r90 top locked
R95 "33R" Res-0603 3257.34,3579.48 r270 top
R96 "10K" Res-0402 3850.24,2864.28 r90 top locked
R97 "49.9R" Res-0603 3545.4,3579.46 r270 top
R98 "10K" Res-0402 3897.48,2864.28 r90 top locked
R99 "49.9R" Res-0603 3645.61,3579.46 r270 top
R100 "1M" Res-0603 3265,4314.14 r90 bottom
R101 "330R" Res-0603 3450.32,4136.89 r90 bottom
R102 "1M" Res-0402 3720.31,2954.28 r0 top locked
R103 "12.4K" Res-0603 3645.61,3465.01 r270 top locked
R104 "75R" Res-0603 4181.47,4217 r270 bottom
R105 "75R" Res-0603 4100,4217 r270 bottom
R106 "0R" Res-0805 4482.73,3266.28 r0 bottom
R107 "0R" Res-0402 4257.92,3664.19 r90 bottom
R108 "24.9K" Res-0603 4339,3265.74 r0 bottom
R109 "348K" RES-0805 4756.6,3617.53 r180 bottom value=348kR
R110 "36.5K" Res-0603 4773.1,3738.53 r0 bottom
R111 "63.4R" Res-0603 4227.73,3265.75 r0 bottom
R112 "0R" Res-0805 4442.73,3538.66 r270 bottom
R113 "267K" Res-0603 4593.61,3683.44 r180 bottom value=267kR
R114 "12K" Res-0603 4773.1,3683.44 r0 bottom value=12kR
R115 "0R" Res-0402 1150,887.13 r270 bottom
R116 "0R" Res-0402 959.46,457.59 r270 bottom
R117 "4.7K" Res-0402 1009.46,356 r90 bottom
R118 "0R" Res-0402 1009.46,457.59 r270 bottom
R119 "0R" Res-0402 1059.46,887.13 r270 bottom
R120 "4.7K" Res-0402 959.46,356 r90 bottom
R121 "0R" Res-0402 1059.46,457.59 r270 bottom
R122 "120R" Res-0603 185.76,763.45 r270 bottom
R123 "10K" Res-0402 1105,887.13 r90 bottom
R124 "133R" Res-0402 4428.5,3658.19 r180 top locked
R125 "15K" Res-0603 5046.59,2894.45 r90 top locked value=15kR
R126 "48.7K" Res-0603 5191.66,2504.1 r90 top locked
R127 "DNP" Res-0603 4430.66,2530.34 r90 top locked value=2.2R
R128 "DNP" Res-0603 4430.67,2878.62 r270 top locked value=2.2R
R129 "10R" Res-0603 5266.72,2764.91 r270 top locked
R130 "10R" Res-0603 5266.72,2997.7 r90 top locked
R131 "75R" Res-0603 4380,4217 r270 bottom
R132 "75R" Res-0603 4293.99,4217 r270 bottom
RN1 "10K" YC164-FR-0710KL 4095.26,3256.1 r180 top locked value=10kR
RN2 "10K" YC164-FR-0710KL 4095.26,2957.8 r180 top locked value=10kR
RN3 "10K" YC164-FR-0710KL 4095.26,3107.27 r180 top locked value=10kR
SW1 "SS-22F07-G010" SS-22F07-G010 212.73,3243.53 r270 top locked
SW2 "TS-1109S-C-B" TS-1109S-C-B 4335.84,1578.53 r180 top locked
SW3 "TS-1109S-C-B" TS-1109S-C-B 4328.79,1990.32 r180 top locked
SW4 "TS-1002S-12026C" TS-1002S-12026C 5773.6,1205.26 r0 top locked
SW5 "TS-1002S-12026C" TS-1002S-12026C 4336.58,1205.26 r0 top locked
SW6 "DPL-02RP" DPL-02RP 6083.53,1524.1 r90 top locked
SW7 "EC11E1820402" EC11E1820402 5055.1,1776.13 r180 top locked
T1 "B1617S" B1617S 3720.4,3850.99 r0 top locked
TP1 "TEST POINT" Test-point 6227.73,3750 r0 top locked
TP2 "TEST POINT" Test-point 5410,2185 r0 top locked
TP3 "TEST POINT" Test-point 4294.48,659.96 r0 top locked
TP4 "TEST POINT" Test-point 80,3659.65 r90 top locked
TP5 "TEST POINT" Test-point 5410,2089.96 r0 top locked
TP6 "TEST POINT" Test-point 5410,1990.96 r0 top locked
U1 "TPS552892RYQR" VQFN-HR-21(3x5) 5079.89,2706.96 r90 top locked
U2 "LM74700QDBVRQ1" SOT-23-6 5987.73,4128.53 r270 bottom
U3 "AP7363-33D-13" TO-252-2L 4740,835.83 r180 bottom
U4 "USBLC6-2SC6" SOT-23-6 380.28,1406.42 r0 bottom
U5 "TPS61022RWUR" "7-VQFN-HR (2x2)" 281.77,3853.1 r180 bottom
U6 "TPS2117DRLR" SOT-583 586.34,1416.07 r180 bottom
U7 "TPS2117DRLR" SOT-583 605.94,2718.14 r180 bottom
U8 "ESP32-S3-WROOM-1U-N16R8" "41-SMD UFL Module" 3607.78,2332.92 r0 top locked
U9 "TCA9535PWR" 24-TSSOP 2883.56,2128.01 r0 top locked
U10 "PCF8563T/F4,118" "SOIC-8(0.154\", 3.90mm Width)" 1681.69,3152.86 r180 bottom
U11 "SLM6600" 8-SO-EP_ 863.9,3459.41 r180 bottom
U12 "MAX17048G+T10" "8-TDFN-EP (2x2)" 1183.02,3917.82 r0 bottom
U13 "SFH617A-2X009T" SFH617A-2X009T 3115.31,3877.54 r270 top
U14 "SFH617A-2X009T" SFH617A-2X009T 2315.31,3877.53 r270 top
U15 "SFH617A-2X009T" SFH617A-2X009T 2915.31,3877.54 r270 top
U16 "SFH617A-2X009T" SFH617A-2X009T 2115.31,3877.54 r270 top
U17 "SFH617A-2X009T" SFH617A-2X009T 2715.31,3877.54 r270 top
U18 "SFH617A-2X009T" SFH617A-2X009T 1915.31,3877.54 r270 top
U19 "SFH617A-2X009T" SFH617A-2X009T 2515.31,3877.54 r270 top
U20 "SFH617A-2X009T" SFH617A-2X009T 1715.31,3877.54 r270 top
U21 "ADS1115IDGSR" VSSOP-10 1433.53,3646.27 r180 bottom
U22 "W5500" "48-LQFP (7x7)_" 3720.81,3201.28 r270 top locked
U23 "SP0504BAHTG" SOT-23-5 3355,3761.53 r270 top locked value=30pF
U24 "TPS54560BQDDARQ1" "8-SO PowerPad" 4682.73,3758.44 r0 top locked
U25 "TPS2378DDAR" "8-SO PowerPad" 4282.92,3472.36 r90 bottom
U26 "SP3485EIM/TR" SOP-8 984.46,685.13 r270 bottom
X1 "32.768kHz" MC-146_ 1890.63,3165.81 r270 bottom
X2 "25MHz" SMD3225-4P 3701.81,2864.28 r0 top locked

## Footprints (in the part's own frame and the unit in brackets; to place one, negate y for a bottom-side part, rotate by r counter-clockwise, add the part's x,y. Pads: shape width x height; smd on the part's side, far side on the other; paste and mask are expansions set on the pad)
"7-VQFN-HR (2x2)" [mm]
  rect 1.15x0.35 smd: 1(-0.8,0.55) 3(-0.8,-0.55)
  rect 1.45x0.2 smd: 2(-0.65,0)
  rect 0.45x0.25 smd: 4(0.8,-0.75) 5(0.8,-0.25) 6(0.8,0.25) 7(0.8,0.75)
  silkscreen extent -1.65,-1.07 0.76,1.07, body extent -1.18,-1 0.82,1, height 1
"8-SO PowerPad" [mm]
  rect 1.55x0.6 smd mask+0.07: 1(-2.7,1.905) 2(-2.7,0.635) 3(-2.7,-0.635) 4(-2.7,-1.905) 5(2.7,-1.905) 6(2.7,-0.635) 7(2.7,0.635) 8(2.7,1.905)
  rect 2.287x2.287 smd mask+0.07: 9(0,0)
  silkscreen extent -3.76,-2.49 1.9,2.49, body extent -3,-2.45 3,2.45, height 1.7
8-SO-EP_ [mm]
  rect 1.505x0.802 smd: 1(-2.497,1.905) 2(-2.497,0.635) 3(-2.497,-0.635) 4(-2.497,-1.905) 5(2.497,-1.905) 6(2.497,-0.635) 7(2.497,0.635) 8(2.497,1.905)
  rect 2.613x3.502 smd: 9(0,0)
  silkscreen extent -3.53,-2.51 2.03,2.51, body extent -3,-2.45 3,2.45, height 1.7
"8-TDFN-EP (2x2)" [mm]
  rect 0.7x0.3 smd: 1(-0.99,0.75) 2(-0.99,0.25) 3(-0.99,-0.25) 4(-0.99,-0.75) 5(0.99,-0.75) 6(0.99,-0.25) 7(0.99,0.25) 8(0.99,0.75)
  rect 0.8x1.38 smd: 9(0,0)
  silkscreen extent -1.63,-1.1 1.05,1.1, body extent -1.05,-1.05 1.05,1.05, height 0.81
20SVPF120M [mm]
  rect 3.5x1.6 smd: 1(-2.8,0) 2(2.8,0)
  silkscreen extent -4.11,-3.3 3.3,3.3, body extent -3.65,-3.3 3.65,3.3, height 5.9
24-TSSOP [mm]
  rect 1.5x0.45 smd: 1(-2.9,3.575) 2(-2.9,2.925) 3(-2.9,2.275) 4(-2.9,1.625) 5(-2.9,0.975) 6(-2.9,0.325) 7(-2.9,-0.325) 8(-2.9,-0.975) 9(-2.9,-1.625) 10(-2.9,-2.275) 11(-2.9,-2.925) 12(-2.9,-3.575) 13(2.9,-3.575) 14(2.9,-2.925) 15(2.9,-2.275) 16(2.9,-1.625) 17(2.9,-0.975) 18(2.9,-0.325) 19(2.9,0.325) 20(2.9,0.975) 21(2.9,1.625) 22(2.9,2.275) 23(2.9,2.925) 24(2.9,3.575)
  silkscreen extent -3.94,-3.96 1.96,3.96, body extent -3.2,-3.9 3.2,3.9, height 1.2
"41-SMD UFL Module" [mm]
  rect 1.5x0.9 smd: 1(-8.75,8.88) 2(-8.75,7.61) 3(-8.75,6.34) 4(-8.75,5.07) 5(-8.75,3.8) 6(-8.75,2.53) 7(-8.75,1.26) 8(-8.75,-0.01) 9(-8.75,-1.28) 10(-8.75,-2.55) 11(-8.75,-3.82) 12(-8.75,-5.09) 13(-8.75,-6.36) 14(-8.75,-7.63) 27(8.75,-7.63) 28(8.75,-6.36) 29(8.75,-5.09) 30(8.75,-3.82) 31(8.75,-2.55) 32(8.75,-1.28) 33(8.75,-0.01) 34(8.75,1.26) 35(8.75,2.53) 36(8.75,3.8) 37(8.75,5.07) 38(8.75,6.34) 39(8.75,7.61) 40(8.75,8.88)
  rect 0.9x1.5 smd: 15(-6.98,-8.88) 16(-5.71,-8.88) 17(-4.44,-8.88) 18(-3.17,-8.88) 19(-1.9,-8.88) 20(-0.63,-8.88) 21(0.64,-8.88) 22(1.91,-8.88) 23(3.18,-8.88) 24(4.45,-8.88) 25(5.72,-8.88) 26(6.99,-8.88)
  rect 3.7x3.7 smd: 41(-1.5,1.26)
  silkscreen extent -9.8,-9.17 9.05,10.11, body extent -9,-9.12 9,10.08, height 3.35
"48-LQFP (7x7)_" [mm]
  rect 1.22x0.32 smd: 1(-4.25,2.75) 2(-4.25,2.25) 3(-4.25,1.75) 4(-4.25,1.25) 5(-4.25,0.75) 6(-4.25,0.25) 7(-4.25,-0.25) 8(-4.25,-0.75) 9(-4.25,-1.25) 10(-4.25,-1.75) 11(-4.25,-2.25) 12(-4.25,-2.75) 25(4.25,-2.75) 26(4.25,-2.25) 27(4.25,-1.75) 28(4.25,-1.25) 29(4.25,-0.75) 30(4.25,-0.25) 31(4.25,0.25) 32(4.25,0.75) 33(4.25,1.25) 34(4.25,1.75) 35(4.25,2.25) 36(4.25,2.75)
  rect 0.32x1.22 smd: 13(-2.75,-4.25) 14(-2.25,-4.25) 15(-1.75,-4.25) 16(-1.25,-4.25) 17(-0.75,-4.25) 18(-0.25,-4.25) 19(0.25,-4.25) 20(0.75,-4.25) 21(1.25,-4.25) 22(1.75,-4.25) 23(2.25,-4.25) 24(2.75,-4.25) 37(2.75,4.25) 38(2.25,4.25) 39(1.75,4.25) 40(1.25,4.25) 41(0.75,4.25) 42(0.25,4.25) 43(-0.25,4.25) 44(-0.75,4.25) 45(-1.25,4.25) 46(-1.75,4.25) 47(-2.25,4.25) 48(-2.75,4.25)
  silkscreen extent -5.16,-3.58 3.66,3.58, body extent -4.51,-4.51 4.49,4.49, height 1.43
ABS [mm]
  rect 0.9x1 smd: 1(-2.86,2) 2(-2.86,-2) 3(2.86,-2) 4(2.86,2)
  silkscreen extent -3.66,-2.25 2.25,2.25, body extent -2.81,-2.5 2.81,2.5, height 1.66
B1617S [mm]
  rect 0.75x2 smd: 1(-4.445,-4.2) 2(-3.175,-4.2) 3(-1.905,-4.2) 4(-0.635,-4.2) 5(0.635,-4.2) 6(1.905,-4.2) 7(3.175,-4.2) 8(4.445,-4.2) 9(4.445,4.2) 10(3.175,4.2) 11(1.905,4.2) 12(0.635,4.2) 13(-0.635,4.2) 14(-1.905,4.2) 15(-3.175,4.2) 16(-4.445,4.2)
  silkscreen extent -6.35,-4.29 6.35,3.5, body extent -6.35,-4.75 6.35,4.75, height 5.95
BH-18650-B1BA002 [mm]
  rect 7.62x5.08 smd paste+0 mask+0.051: 1(-4,-41.313) 2(-4,41.313)
  round 0 hole 2.4 unplated paste-2539.97: ""(4,35.84)
  silkscreen extent -14.35,-38.54 6.35,38.54, body extent -14.27,-43 6.39,43.03, height 14.96
Cap-0402 [mil]
  rect 18x25 smd mask+2.36: 1(-18.5,0) 2(18.5,0)
  silkscreen extent -31,-16 31,16, body extent -20,-10 20,10, height 19
Cap-0603 [mil]
  rect 30x35 smd mask+2.36: 1(-30,0) 2(30,0)
  silkscreen extent -49,-21 49,21, body extent -32,-16 31,16, height 34
Cap-0805 [mil] "SMD 0805"
  rect 40x60 smd mask+2.76: 1(-40,0) 2(40,0)
  silkscreen extent -64,-34 64,34, body extent -39,-25 39,25, height 30
Cap-1206 [mil] "SMD 1206"
  rect 60x70 smd: 1(-50,0) 2(50,0)
  silkscreen extent -84,-39 84,39, body extent -63,-31 63,32, height 39
Cap-1210 [mil] "SMD 1210"
  rect 60x110 smd: 1(-50,0) 2(50,0)
  silkscreen extent -84,-59 84,59, body extent -63,-49 63,49, height 39
Case-E [mm]
  rect 2.79x2.57 smd: 1(0,0) 2(6.44,0)
  silkscreen extent -1.56,-2.31 7.03,2.31, body extent -0.27,-2.21 6.92,2.21, height 2.88
CR2032-BS-6-1 [mm]
  rect 3x4.2 smd: 1(14.5,0) 2(-14.5,0)
  silkscreen extent -14.41,-8.03 14.09,8.12, body extent -15.65,-8 15.65,8, height 5.6
DB128L-5.08-2P-GN-S [mm]
  round 2.8 hole 1.6: 1(-2.54,0) 2(2.54,0)
  silkscreen extent -5.7,-5.1 5.1,4.95, body extent -5.68,-5.12 5.08,4.88, height 14
DB128L-5.08-3P-GN-S [mm]
  rect 2.4x2.4 hole 1.6 paste-2539.97 mask+0.051: 1(0,0)
  round 2.4 hole 1.6 paste-2539.97 mask+0.051: 2(5.08,0) 3(10.16,0)
  silkscreen extent -2.54,-5.1 13.2,5, body extent -2.54,-5.1 13.2,5, height 14.1
DB128L-5.08-4P-GN-S [mm]
  rect 2.8x2.8 hole 1.5 slot 1.575 at 0 deg paste-2539.97 mask+0.05: 1(-7.62,0)
  round 2.8 hole 1.5 slot 1.575 at 0 deg paste-2539.97 mask+0.05: 2(-2.54,0) 3(2.54,0) 4(7.62,0)
  silkscreen extent -10.03,-5 10.92,5.1, body extent -10.16,-4.88 10.76,5.12, height 14
DB128V-5.08-9P-GN-S [mm]
  rect 2.3x2.3 hole 1.5 paste-2539.97 mask+0.05: 1(-20.32,0)
  round 2.3 hole 1.5 paste-2539.97 mask+0.05: 2(-15.24,0) 3(-10.16,0) 4(-5.08,0) 5(0,0) 6(5.08,0) 7(10.16,0) 8(15.24,0) 9(20.32,0)
  silkscreen extent -23.42,-5.21 22.86,5, body extent -23.46,-5.2 22.86,5, height 14
DPL-02RP [mm]
  rect 1.7x1.7 hole 1.1 paste-2539.97 mask+0.051: 1(-1.27,-3.81)
  round 1.7 hole 1.1 paste-2539.97 mask+0.051: 2(1.27,-3.81) 3(1.27,3.81) 4(-1.27,3.81)
  silkscreen extent -3.32,-7.26 3.32,5.46, body extent -3.32,-7.21 3.32,5.42, height 9.4
EC11E1820402 [mm]
  round 2 hole 1.1 paste-2539.97 mask+0.051: A(-2.54,-7.25) B(2.54,-7.25) C(0,-7.25) D(-2.54,7.25) E(2.54,7.25)
  rect 3x4 hole 1.6 square paste-2539.97 mask+0.051: F(6.25,0.25) G(-6.25,0.25)
  silkscreen extent -5.85,-5.75 5.85,6.25, body extent -6.29,-7.35 6.29,7.35, height 24.5
EEEFK1J220P [mm]
  rect 4x1.6 smd: 1(-3.1,0) 2(3.1,0)
  silkscreen extent -4.99,-4.15 4.15,4.15, body extent -4.5,-4.15 4.5,4.15, height 6.2
FCH1365-680M [mm]
  rect 3.5x5 smd paste+0 mask+0.051: 1(-5.7,0) 2(5.7,0)
  silkscreen extent -6.9,-6.3 6.9,6.3, body extent -7.2,-6.4 7.2,6.4, height 6.51
"Fuse 1206 (3216 Metric)" [mm] "0.126\" L x 0.062\" W x 0.026\" H (3.20mm x 1.58mm x 0.65mm)"
  rect 1.06x1.82 smd: 1(-1.528,0) 2(1.528,0)
  silkscreen extent -0.68,-0.85 0.68,0.85, body extent -1.6,-0.79 1.6,0.79, height 0.85
Fuse-0805 [mm]
  rect 1x1.7 smd: 1(-1.1,0) 2(1.1,0)
  silkscreen extent -0.41,-0.81 0.41,0.81, body extent -1.1,-0.75 1.1,0.75, height 1.24
FUSE-1210 [mm]
  rect 1.15x3.2 smd: 1(-1.34,0) 2(1.34,0)
  silkscreen extent -1.71,-1.8 1.71,1.8, body extent -1.61,-1.29 1.61,1.29, height 1.8
G5RL-1A-E-HR-DC5 [mm]
  rect 2.5x2.5 hole 1.5: 1(-12.501,-3.75)
  round 2.5 hole 1.5: 3(7.499,-3.75) 4(12.501,-3.75) 5(12.501,3.75) 6(7.499,3.75) 8(-12.501,3.75)
  silkscreen extent -14.8,-6.32 14.2,6.4, body extent -14.82,-6.34 14.18,6.37, height 16.2
HDR1X2_ [mm] "CONN HEADER VERT 2POS 2.54MM"
  rect 1.5x1.5 hole 0.9: 1(0,0)
  round 1.5 hole 0.9: 2(2.54,0)
  silkscreen extent -1.27,-1.27 3.81,1.27, body extent -1.27,-1.27 3.81,1.27, height 8.44
"HDR1X4 Female" [mm]
  rect 1.6x1.6 hole 0.95: 1(-3.81,0)
  round 1.6 hole 0.95: 2(-1.27,0) 3(1.27,0) 4(3.81,0)
  silkscreen extent -5.49,-1.27 5.36,1.27, body extent -5.38,-1.3 5.28,1.24, height 8.5
"IND-0603 (1608 Metric)" [mm] "0.063\" L x 0.032\" W (1.60mm x 0.80mm)"
  rect 0.6x0.8 smd: 1(-0.7,0) 2(0.7,0)
  silkscreen extent -0.2,-0.46 0.23,0.46, body extent -0.8,-0.4 0.8,0.4, height 0.78
Ind-0805 [mm] "Inductor 0805"
  rect 1.2x1.32 smd: 1(-1,0) 2(1,0)
  silkscreen extent -0.25,-0.69 0.25,0.69, body extent -1,-0.62 1,0.63, height 0.47
LED-0603 [mm]
  rect 0.5x1 smd: 1(-0.75,0) 2(0.75,0)
  silkscreen extent -1.12,-0.66 1.75,0.66, body extent -0.82,-0.37 0.82,0.36, height 0.68
MC-146_ [mm]
  rect 1.2x0.6 smd: 1(-3.15,-0.45) 2(3.15,-0.45) 3(3.15,0.45) 4(-3.15,0.45)
  silkscreen extent -4.01,-0.81 2.31,0.81, body extent -3.35,-0.75 3.55,0.75, height 1.45
OVZ121M1VTR-1013 [mm]
  rect 3.91x1.261 smd paste+0 mask+0.051: 1(-4.205,0) 2(4.205,0)
  silkscreen extent -6.3,-5.28 5.28,5.28, body extent -5.5,-5.2 5.5,5.2, height 12.61
PowerDI-3333-8 [mm]
  rect 0.7x0.42 smd paste-100 mask+0.05: 1(-0.97,0.975) 2(-0.97,0.325) 3(-0.97,-0.325) 4(-0.97,-0.975)
  oval 1.35x1.44 smd: 5(0.97,0)
  Top Layer region: 0.14,1.2 2.39,1.2 2.39,0.75 1.8,0.75 1.8,0.55 2.39,0.55 2.39,0.1 1.8,0.1 1.8,-0.1 2.39,-0.1 2.39,-0.55 1.8,-0.55 1.8,-0.75 2.39,-0.75 2.39,-1.2 0.14,-1.2 0.14,1.2
  silkscreen extent -1.59,-1.73 2.03,1.73, body extent -1.12,-1.66 2.2,1.66, height 0.81
R-RJ45R08P-C000 [mil]
  round 60 hole 36 paste-99999 mask+2: 1(140.55,-79.73) 2(100.39,-9.64) 3(60.24,-79.73) 4(20.08,-9.64) 5(-20.08,-79.73) 6(-60.24,-9.64) 7(-100.39,-79.73) 8(-140.55,-9.64) 9(-270.08,179.73) 10(-179.92,179.73) 11(179.92,179.73) 12(270.08,179.73)
  round 98.42 hole 74.8 paste-99999 mask+2: 13(320.08,-39.56) 14(-320.08,-39.56)
  round 0 hole 127.95 unplated paste-99999 mask+2: MH(-250,-179.73) MH1(250,-179.72)
  silkscreen extent -326,-399 325,237, body extent -324,-397 324,235, height 547
Res-0402 [mil]
  rect 18x25 smd mask+2.17: 1(-18.5,0) 2(18.5,0)
  silkscreen extent -32,-17 32,16, body extent -23,-11 23,11, height 16
res-0603 [mil]
  rect 30x35 smd: 1(-30,0) 2(30,0)
  silkscreen extent -48,-21 48,21, body extent -31,-17 31,17, height 18
Res-0603 [mil]
  rect 30x35 smd: 1(-30,0) 2(30,0)
  silkscreen extent -48,-21 48,21, body extent -31,-17 31,17, height 18
Res-0805 [mil] "SMD 0805"
  rect 40x50 smd: 1(-40,0) 2(40,0)
  silkscreen extent -64,-29 64,29, body extent -39,-25 39,24, height 24
RES-0805 [mil] "SMD 0805"
  rect 40x50 smd: 1(-40,0) 2(40,0)
  silkscreen extent -64,-29 64,29, body extent -39,-25 39,24, height 24
RES-2512 [mm]
  rect 1.6x3.4 smd: 1(-3.25,0) 2(3.25,0)
  silkscreen extent -4.24,-1.85 4.24,1.85, body extent -3.17,-1.63 3.18,1.63, height 0.58
RVT1E470M0505 [mm]
  rect 2.7x0.91 smd paste+0 mask+0.051: 1(-2.4,0) 2(2.4,0)
  silkscreen extent -3.64,-2.65 2.66,2.65, body extent -2.85,-2.65 2.85,2.65, height 5.4
RVT1H470M0607 [mm]
  rect 3.5x1.6 smd: 1(-2.8,0) 2(2.8,0)
  silkscreen extent -4.27,-3.33 3.32,3.33, body extent -3.5,-3.3 3.5,3.3, height 7.7
RVT1H680M0607 [mm]
  rect 3.5x1.6 smd: 1(-2.7,0) 2(2.7,0)
  silkscreen extent -4.25,-3.33 3.35,3.33, body extent -3.3,-3.3 3.3,3.3, height 7.94
SFH617A-2X009T [mm]
  rect 1.52x1.78 smd mask+0.07: 1(-4.765,1.27) 2(-4.765,-1.27) 3(4.765,-1.27) 4(4.765,1.27)
  silkscreen extent -5.81,-2.36 3.53,2.36, body extent -5.08,-2.29 5.08,2.29, height 3.75
SMA [mm]
  rect 2.5x1.7 smd: 1(-2,0) 2(2,0)
  silkscreen extent -4.45,-1.42 2.06,1.42, body extent -2.6,-1.3 2.6,1.3, height 2.4
SMA(DO-214AC) [mm]
  rect 1.6x2.8 smd: 1(-1.9,0) 2(1.9,0)
  silkscreen extent -3.99,-1.6 2.84,1.6, body extent -2.6,-1.45 2.6,1.45, height 2.3
SMB_ [mm]
  rect 2.8x2.4 smd: 1(-2.3,0) 2(2.3,0)
  silkscreen extent -2.21,-1.9 4.83,1.91, body extent -2.7,-1.8 2.7,1.8, height 2.3
SMD3225-4P [mm]
  rect 1.4x1.2 smd: 1(-1.1,-0.85) 2(1.1,-0.85) 3(1.1,0.85) 4(-1.1,0.85)
  silkscreen extent -2.08,-1.3 1.65,1.3, body extent -1.6,-1.25 1.6,1.25, height 0.81
SOD323F [mm]
  rect 0.6x0.6 smd: 1(-1.05,0) 2(1.05,0)
  silkscreen extent -0.91,-0.79 2.11,0.79, body extent -1.25,-0.67 1.25,0.68, height 1
SOD-123 [mm]
  rect 0.95x0.9 smd: 1(-1.575,0) 2(1.575,0)
  silkscreen extent -1.37,-0.8 2.82,0.8, body extent -1.82,-0.77 1.83,0.78, height 1.5
SOD-123FL [mm]
  rect 1.34x1.8 smd: 1(-1.43,0) 2(1.43,0)
  silkscreen extent -3.25,-1.17 2.26,1.17, body extent -1.8,-0.82 1.8,0.82, height 0.95
"SOD-323 (Bi-directional)" [mm]
  rect 0.8x0.9 smd mask+0.055: 1(-1.15,0) 2(1.15,0)
  silkscreen extent -0.94,-0.74 0.94,0.74, body extent -1.3,-0.67 1.3,0.67, height 1.1
"SOIC-8(0.154\", 3.90mm Width)" [mm]
  rect 1.55x0.6 smd: 1(-2.7,1.905) 2(-2.7,0.635) 3(-2.7,-0.635) 4(-2.7,-1.905) 5(2.7,-1.905) 6(2.7,-0.635) 7(2.7,0.635) 8(2.7,1.905)
  silkscreen extent -3.79,-2.51 1.8,2.51, body extent -3.01,-2.45 3.01,2.45, height 1.63
SOP-8 [mm]
  rect 1.3x0.7 smd: 1(-2.75,1.905) 2(-2.75,0.635) 3(-2.75,-0.635) 4(-2.75,-1.905) 5(2.75,-1.905) 6(2.75,-0.635) 7(2.75,0.635) 8(2.75,1.905)
  silkscreen extent -3.69,-2.57 2.03,2.57, body extent -3.1,-2.5 3.1,2.5, height 1.76
SOT-23 [mm] "TRANS NPN 40V 0.6A SOT23"
  rect 0.82x0.92 smd: 1(-0.95,-1) 2(0.95,-1) 3(0,1)
  silkscreen extent -1.68,-1.3 1.55,0.81, body extent -1.5,-1.25 1.5,1.25, height 1.05
Sot-23 [mm] "TRANS NPN 40V 0.6A SOT23"
  rect 0.82x0.92 smd: 1(-0.95,-1) 2(0.95,-1) 3(0,1)
  silkscreen extent -1.68,-1.3 1.55,0.81, body extent -1.5,-1.25 1.5,1.25, height 1.05
SOT-23-5 [mm]
  rect 1.1x0.6 smd: 1(-1.3,0.95) 2(-1.3,0) 3(-1.3,-0.95) 4(1.3,-0.95) 5(1.3,0.95)
  silkscreen extent -2.13,-1.5 0.88,1.5, body extent -1.4,-1.45 1.4,1.45, height 1.45
SOT-23-6 [mm]
  rect 1.22x0.62 smd: 1(-1.31,0.95) 2(-1.31,0) 3(-1.31,-0.95) 4(1.31,-0.95) 5(1.31,0) 6(1.31,0.95)
  silkscreen extent -2.18,-1.52 0.86,1.52, body extent -1.5,-1.5 1.5,1.5, height 1.47
SOT-583 [mm]
  rect 0.67x0.32 smd mask+0.055: 1(-0.735,0.75) 2(-0.735,0.25) 3(-0.735,-0.25) 4(-0.735,-0.75) 5(0.735,-0.75) 6(0.735,-0.25) 7(0.735,0.25) 8(0.735,0.75)
  silkscreen extent -1.32,-1.1 0.6,1.1, body extent -0.8,-1.05 0.8,1.05, height 0.6
SOT-723 [mm]
  rect 0.5x0.45 smd: 1(-0.4,-0.575) 2(0.4,-0.575) 3(0,0.575)
  silkscreen extent -0.94,-0.66 0.64,0.64, body extent -0.6,-0.6 0.6,0.6, height 0.5
SS-22F07-G010 [mm]
  rect 1.9x1.9 hole 1.2 paste-2539.97 mask+0.05: 1(-4,1.3)
  round 1.9 hole 1.2 paste-2539.97 mask+0.05: 2(0,1.3) 3(4,1.3) 4(-4,-1.3) 5(0,-1.3) 6(4,-1.3)
  oval 1.4x3 hole 0.7 slot 2.3 at 90 deg paste-2539.97 mask+0.05: 7(-8.25,0) 8(8.25,0)
  silkscreen extent -8.25,-3.81 8.26,3.81, body extent -8.5,-3.75 8.5,3.75, height 19.1
Test-point [mil]
  oct 60x60 smd: 1(0,0)
  silkscreen extent -37,-37 37,37
TO-252-2L [mm]
  rect 1.5x2.5 smd: 1(-2.3,-3.45) 3(2.3,-3.45)
  rect 7x7 smd: 2(0,3.45)
  silkscreen extent -3.35,-3.53 3.33,-0.2, body extent -3.27,-4.31 3.27,5.63, height 2.34
TS-1002S-12026C [mm]
  rect 2.3x1.5 smd: 1(-4.55,2.25) 2(4.55,2.25) 3(-4.55,-2.25) 4(4.55,-2.25)
  silkscreen extent -6.1,-3 3,3, body extent -4.5,-3 4.5,3, height 12
TS-1109S-C-B [mm]
  rect 1.4x1.1 smd: 1(-3.25,-1.5) 2(3.25,-1.5) 3(3.25,1.5) 4(-3.25,1.5)
  silkscreen extent -2.41,-2.31 2.41,2.31, body extent -3.5,-2.25 3.5,2.25, height 4.3
U263-163N-4BQC65 [mm]
  rect 0.3x0.87 smd: A1(-2.75,0.865) A4(-1.25,0.865) A5(-0.75,0.865) A6(-0.25,0.865) A7(0.25,0.865) A8(0.75,0.865) A9(1.25,0.865) A12(2.75,0.865) B1(2.75,-0.865) B4(1.25,-0.865) B5(0.75,-0.865) B6(0.25,-0.865) B7(-0.25,-0.865) B8(-0.75,-0.865) B9(-1.25,-0.865) B12(-2.75,-0.865)
  round 0 hole 0.52 unplated: MH(-3.75,0)
  round 0 hole 0.6 slot 0.72 at 0 deg unplated: MH(3.75,0)
  oval 1.35x1.1 hole 0.6 slot 0.85 at 0 deg: S1(-2.4,2.15) S2(2.4,2.15) S3(2.4,-2.15) S4(-2.4,-2.15)
  silkscreen extent -4.39,-1.7 4.39,1.7, body extent -4.49,-2.28 4.45,2.32, height 6.55
UCD-220uF-10mmDia [mm] "0.406\" L x 0.406\" W (10.30mm x 10.30mm)"
  rect 4x2.5 smd: 1(-4,0) 2(4,0)
  silkscreen extent -5.95,-5.21 5.13,5.21, body extent -5.45,-5.15 5.45,5.15, height 10.8
"Voltlink Target" [mm]
  rect 0.5x1.6 smd: 1(-2.5,-1.263) 2(-1.5,-1.263) 3(-0.5,-1.263) 4(0.5,-1.263) 5(1.5,-1.263) 6(2.5,-1.263)
  rect 1.2x1.8 smd: MP1(-3.8,1.263) MP2(3.8,1.263)
  silkscreen extent -4.06,-1.68 4.06,2.17, body extent -4,-1.49 4,2.11, height 4.25
VQFN-HR-21(3x5) [mm]
  rect 0.6x0.25 smd paste+0 mask+0.051: 1(-2.4,0.75) 2(-2.4,0.25) 3(-2.4,-0.25) 4(-2.4,-0.75) 14(2.4,-0.75) 15(2.4,-0.25) 16(2.4,0.25) 17(2.4,0.75)
  rect 0.25x0.65 smd paste+0 mask+0.051: 5(-2.04,-1.375) 13(2.04,-1.375) 18(2.04,1.375) 21(-2.04,1.375)
  rect 0.25x0.6 smd paste+0 mask+0.051: 6(-1.54,-1.4) 12(1.54,-1.4) 19(1.54,1.4) 20(-1.54,1.4)
  rect 0.25x3.4 smd paste+0 mask+0.051: 7(-1.04,0) 8(-0.54,0) 10(0.54,0) 11(1.04,0)
  rect 0.33x3.4 smd paste+0 mask+0.051: 9(0,0)
  silkscreen extent -2.96,-1.58 2.58,1.58, body extent -2.5,-1.5 2.5,1.5, height 1
VSSOP-10 [mm]
  rect 1.45x0.3 smd paste+0 mask+0.05: 1(-2.2,1) 2(-2.2,0.5) 3(-2.2,0) 4(-2.2,-0.5) 5(-2.2,-1) 6(2.2,-1) 7(2.2,-0.5) 8(2.2,0) 9(2.2,0.5) 10(2.2,1)
  silkscreen extent -3.17,-1.55 1.47,1.55, body extent -2.45,-1.5 2.45,1.5, height 1.07
WS2812B-XF02/W [mm]
  rect 1.5x1 smd: 1(-2.5,1.65) 2(-2.5,-1.65) 3(2.5,-1.65) 4(2.5,1.65)
  silkscreen extent -3.56,-2.55 2.5,2.55, body extent -2.7,-2.5 2.7,2.5, height 1.55
XDFH-0259-2*3P [mm]
  rect 1.8x1.8 hole 1.1: 1(-2.54,-1.27)
  round 1.8 hole 1.1: 2(-2.54,1.27) 3(0,-1.27) 4(0,1.27) 5(2.54,-1.27) 6(2.54,1.27)
  silkscreen extent -7.62,-0.19 7.62,10.93, body extent -7.61,-1.61 7.61,10.91, height 8.91
XFL4020-102MEC [mm]
  rect 0.98x3.4 smd: 1(-1.185,0) 2(1.185,0)
  silkscreen extent -2.03,-2.03 2.01,2.03, body extent -2,-2 2,2, height 2.1
YC164-FR-0710KL [mm]
  rect 0.9x0.65 smd: 1(0,0) 4(0,-2.48) 5(1.77,-2.48) 8(1.77,0)
  rect 0.9x0.53 smd: 2(0,-0.84) 3(0,-1.64) 6(1.77,-1.64) 7(1.77,-0.84)
  silkscreen extent -0.79,-2.96 1.76,0.48, body extent 0.08,-2.84 1.69,0.36, height 0.7
YSPI0520-2R2M_ [mm]
  rect 2x2.5 smd: 1(-2.5,0) 2(2.5,0)
  silkscreen extent -2.7,-2.6 2.7,2.6, body extent -2.7,-2.6 2.7,2.6, height 1.8
YSPI1050-4R7M [mm]
  rect 2.924x3.5 smd paste+0 mask+0.051: 1(-5.18,0) 2(5.18,0)
  silkscreen extent -5.74,-5.3 5.75,5.3, body extent -5.75,-5.25 5.75,5.25, height 4.13